# Altium PCB BLDC-Driver-v2.0.PcbDoc (part 1 of 6)
Units mil, origin at the board's own origin, x right, y up, seen from the top; angles counter-clockwise.
Board outline 5905.51 x 4330.71 mil, 4 copper layers (Top Layer, Layer 1, Layer 2, Bottom Layer), stack 62.047 mil thick; 284 components, 198 nets, 819 pads, 521 vias.
Unrouted connection lines stored in the file: 1.
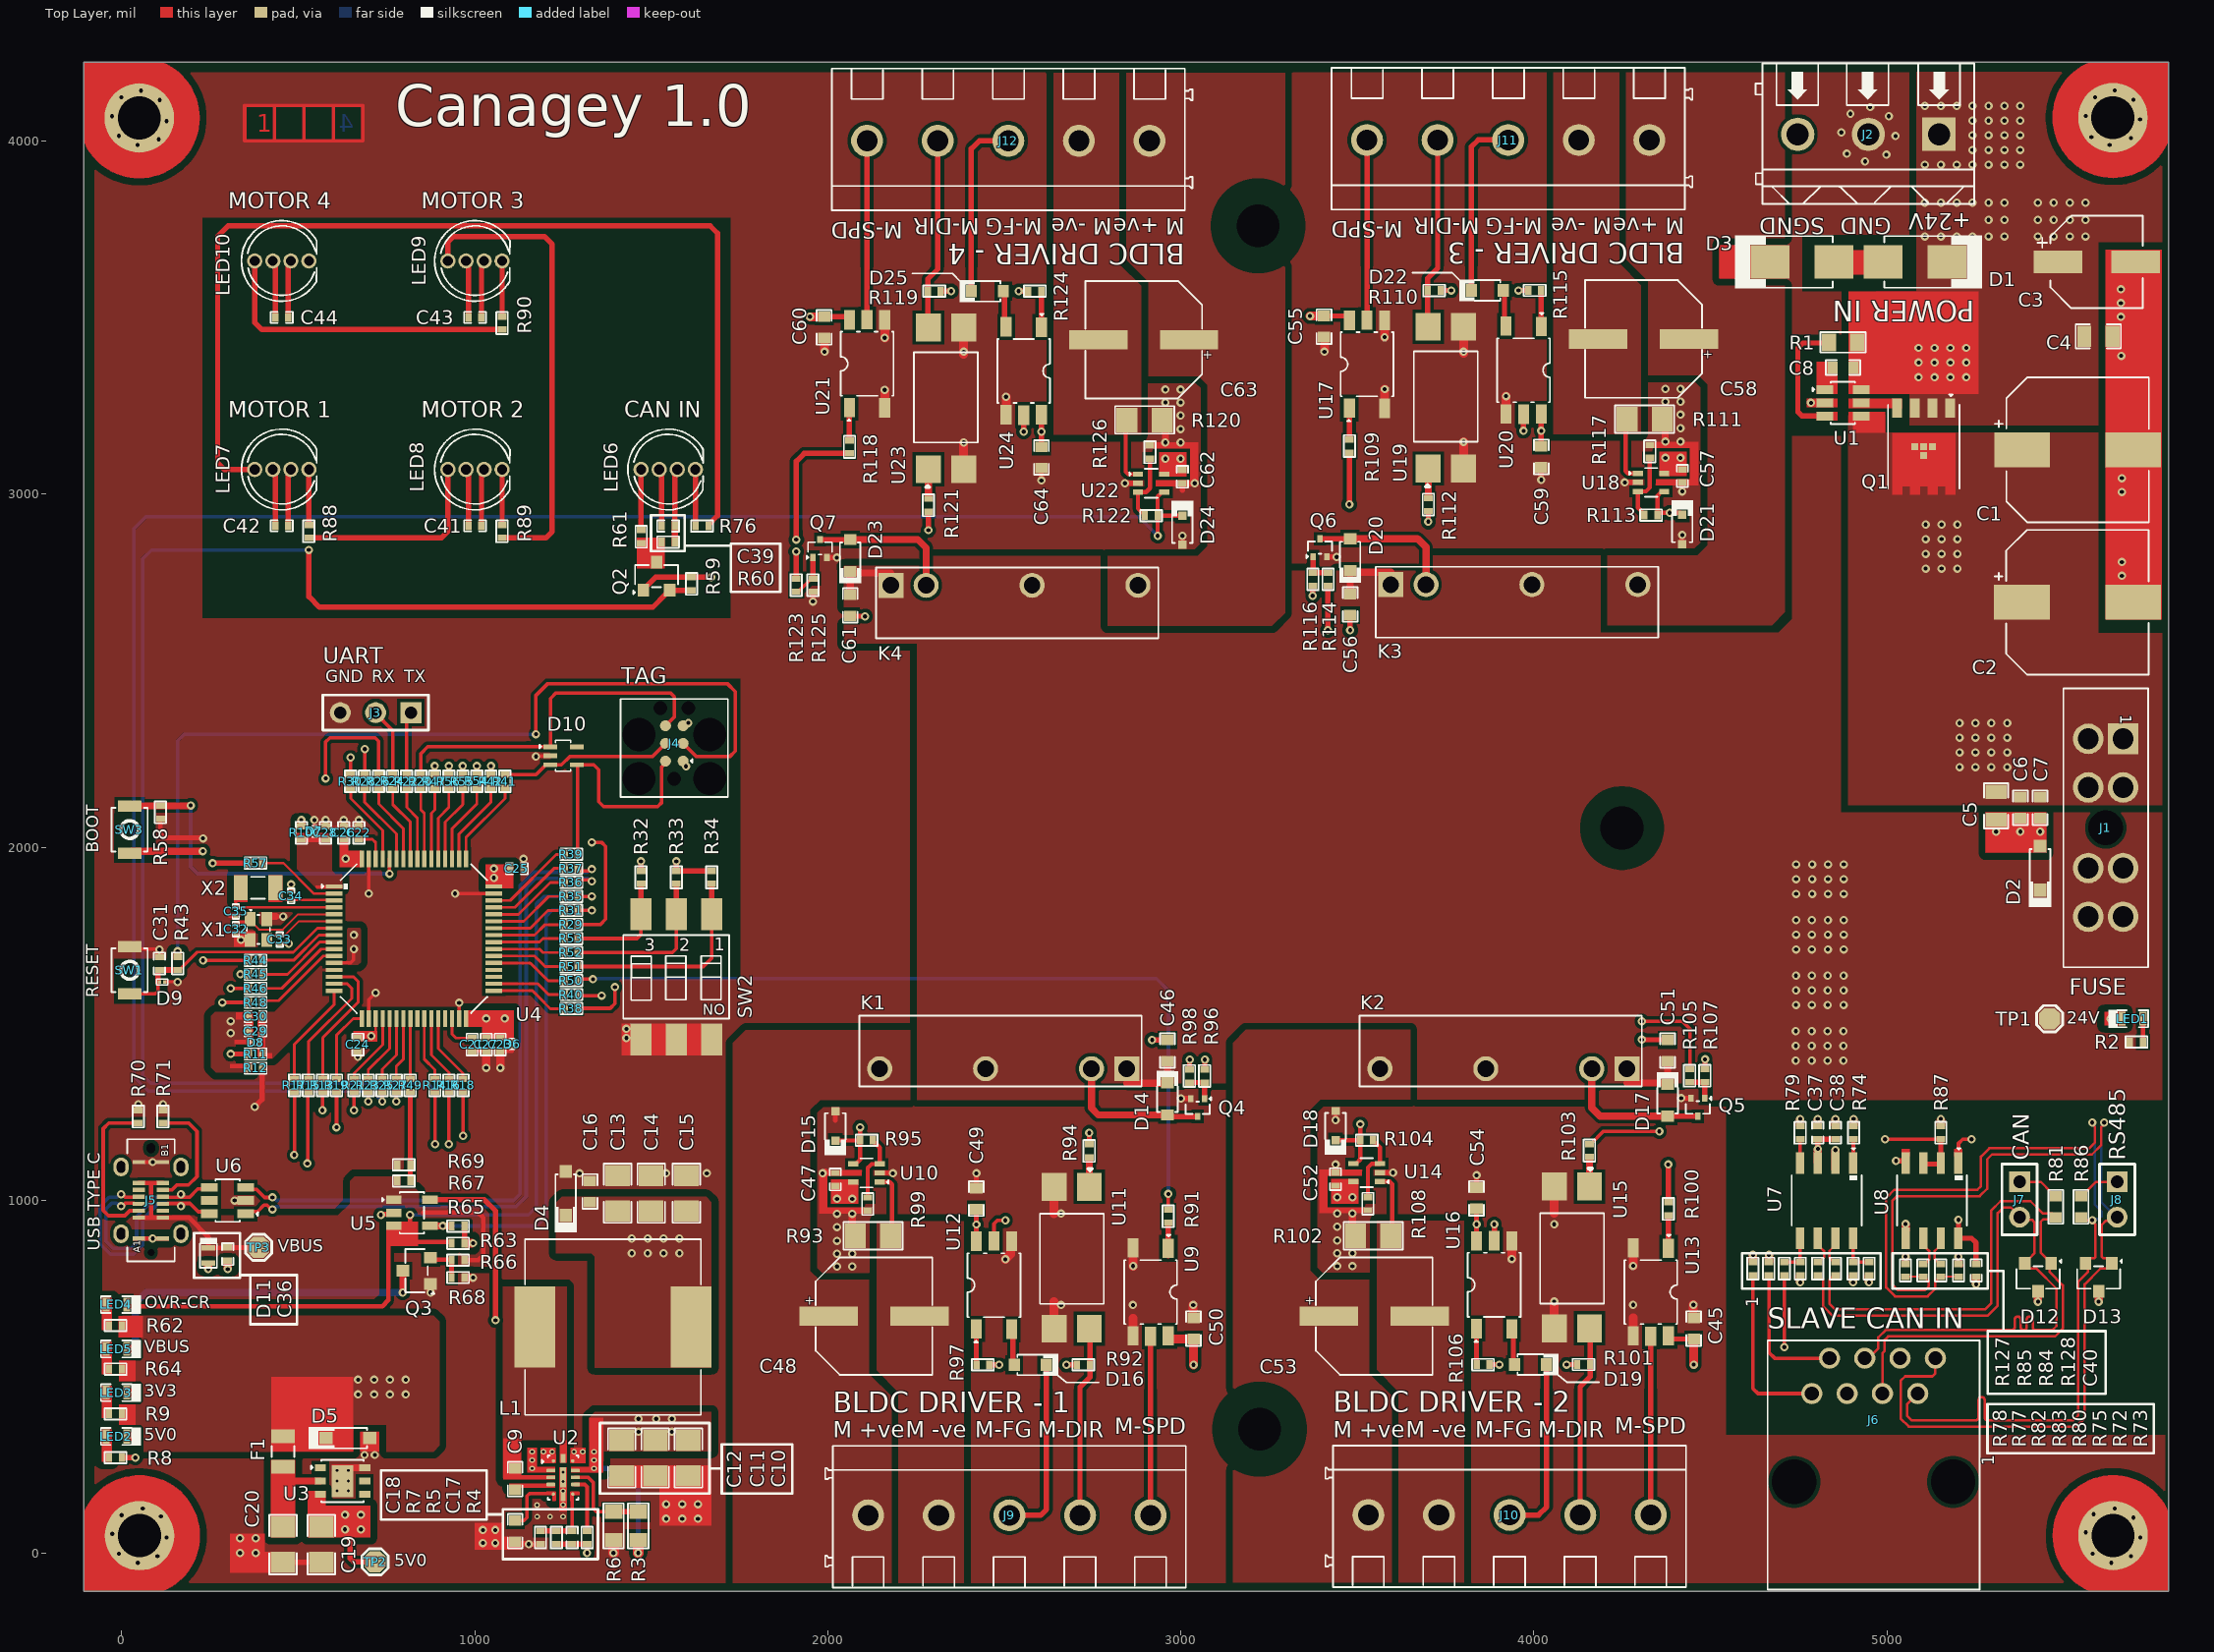
[diagram p0: Top Layer view]
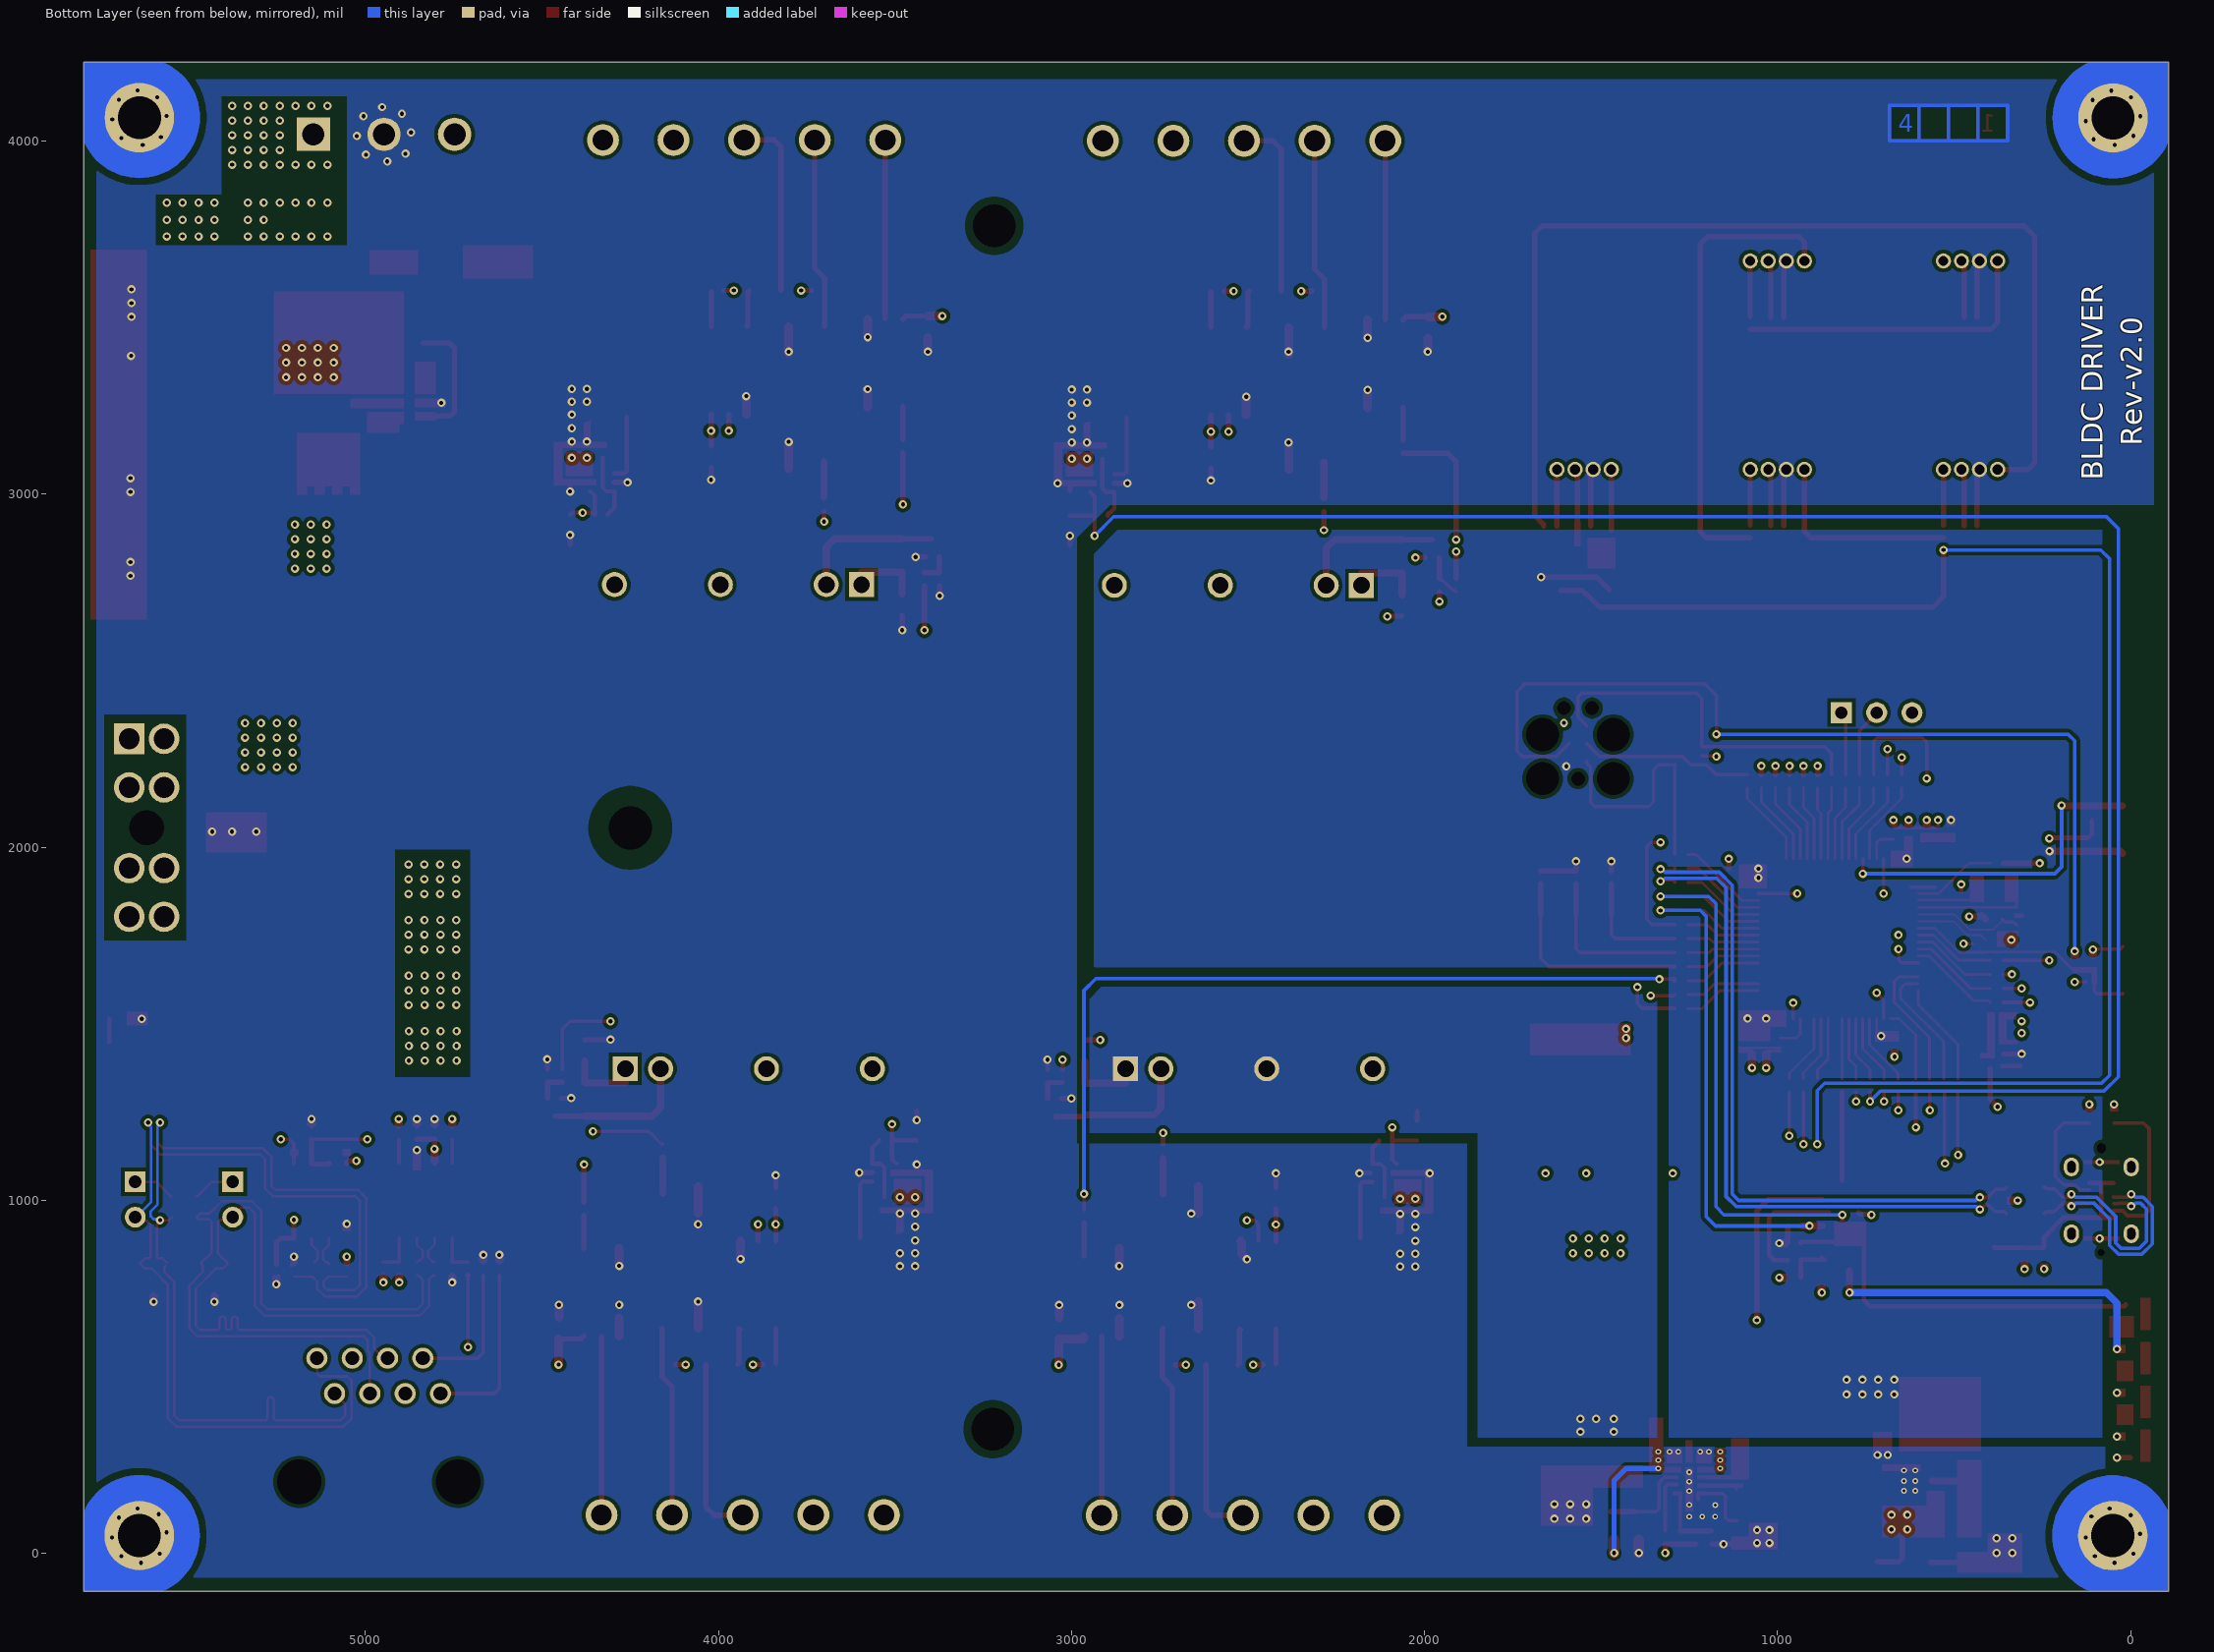
[diagram p1: Bottom Layer view, seen from below]
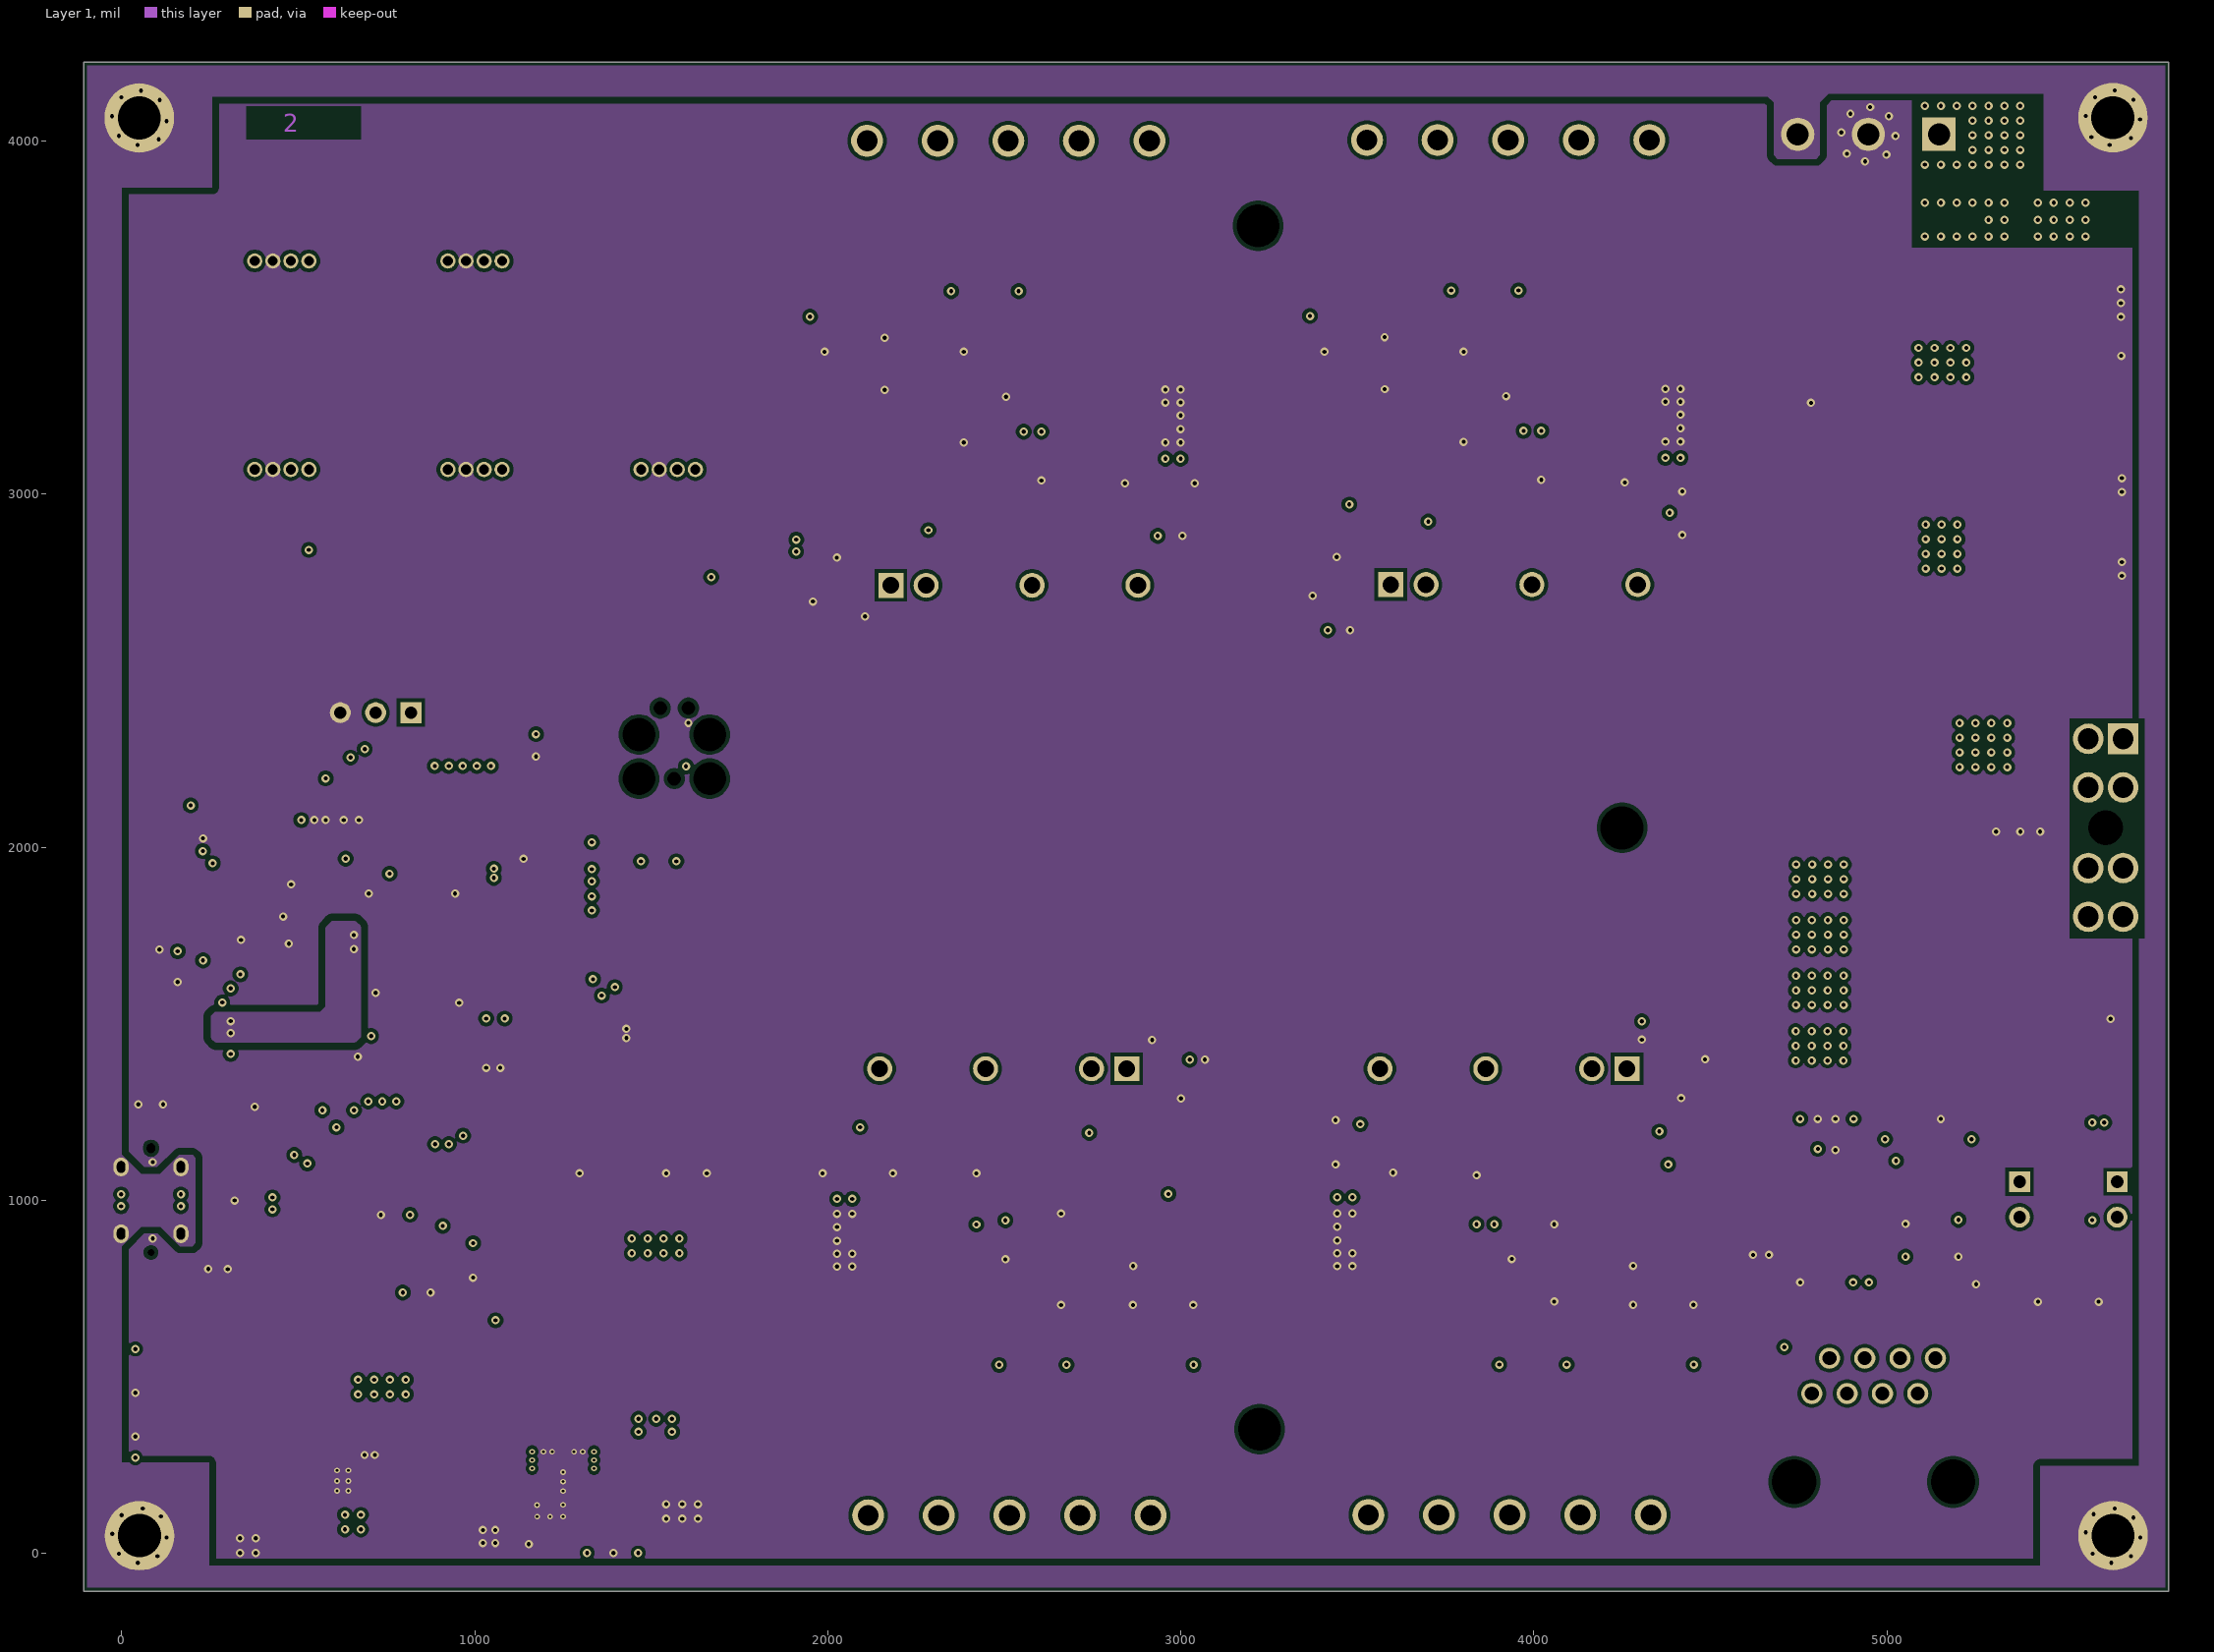
[diagram p2: Layer 1]
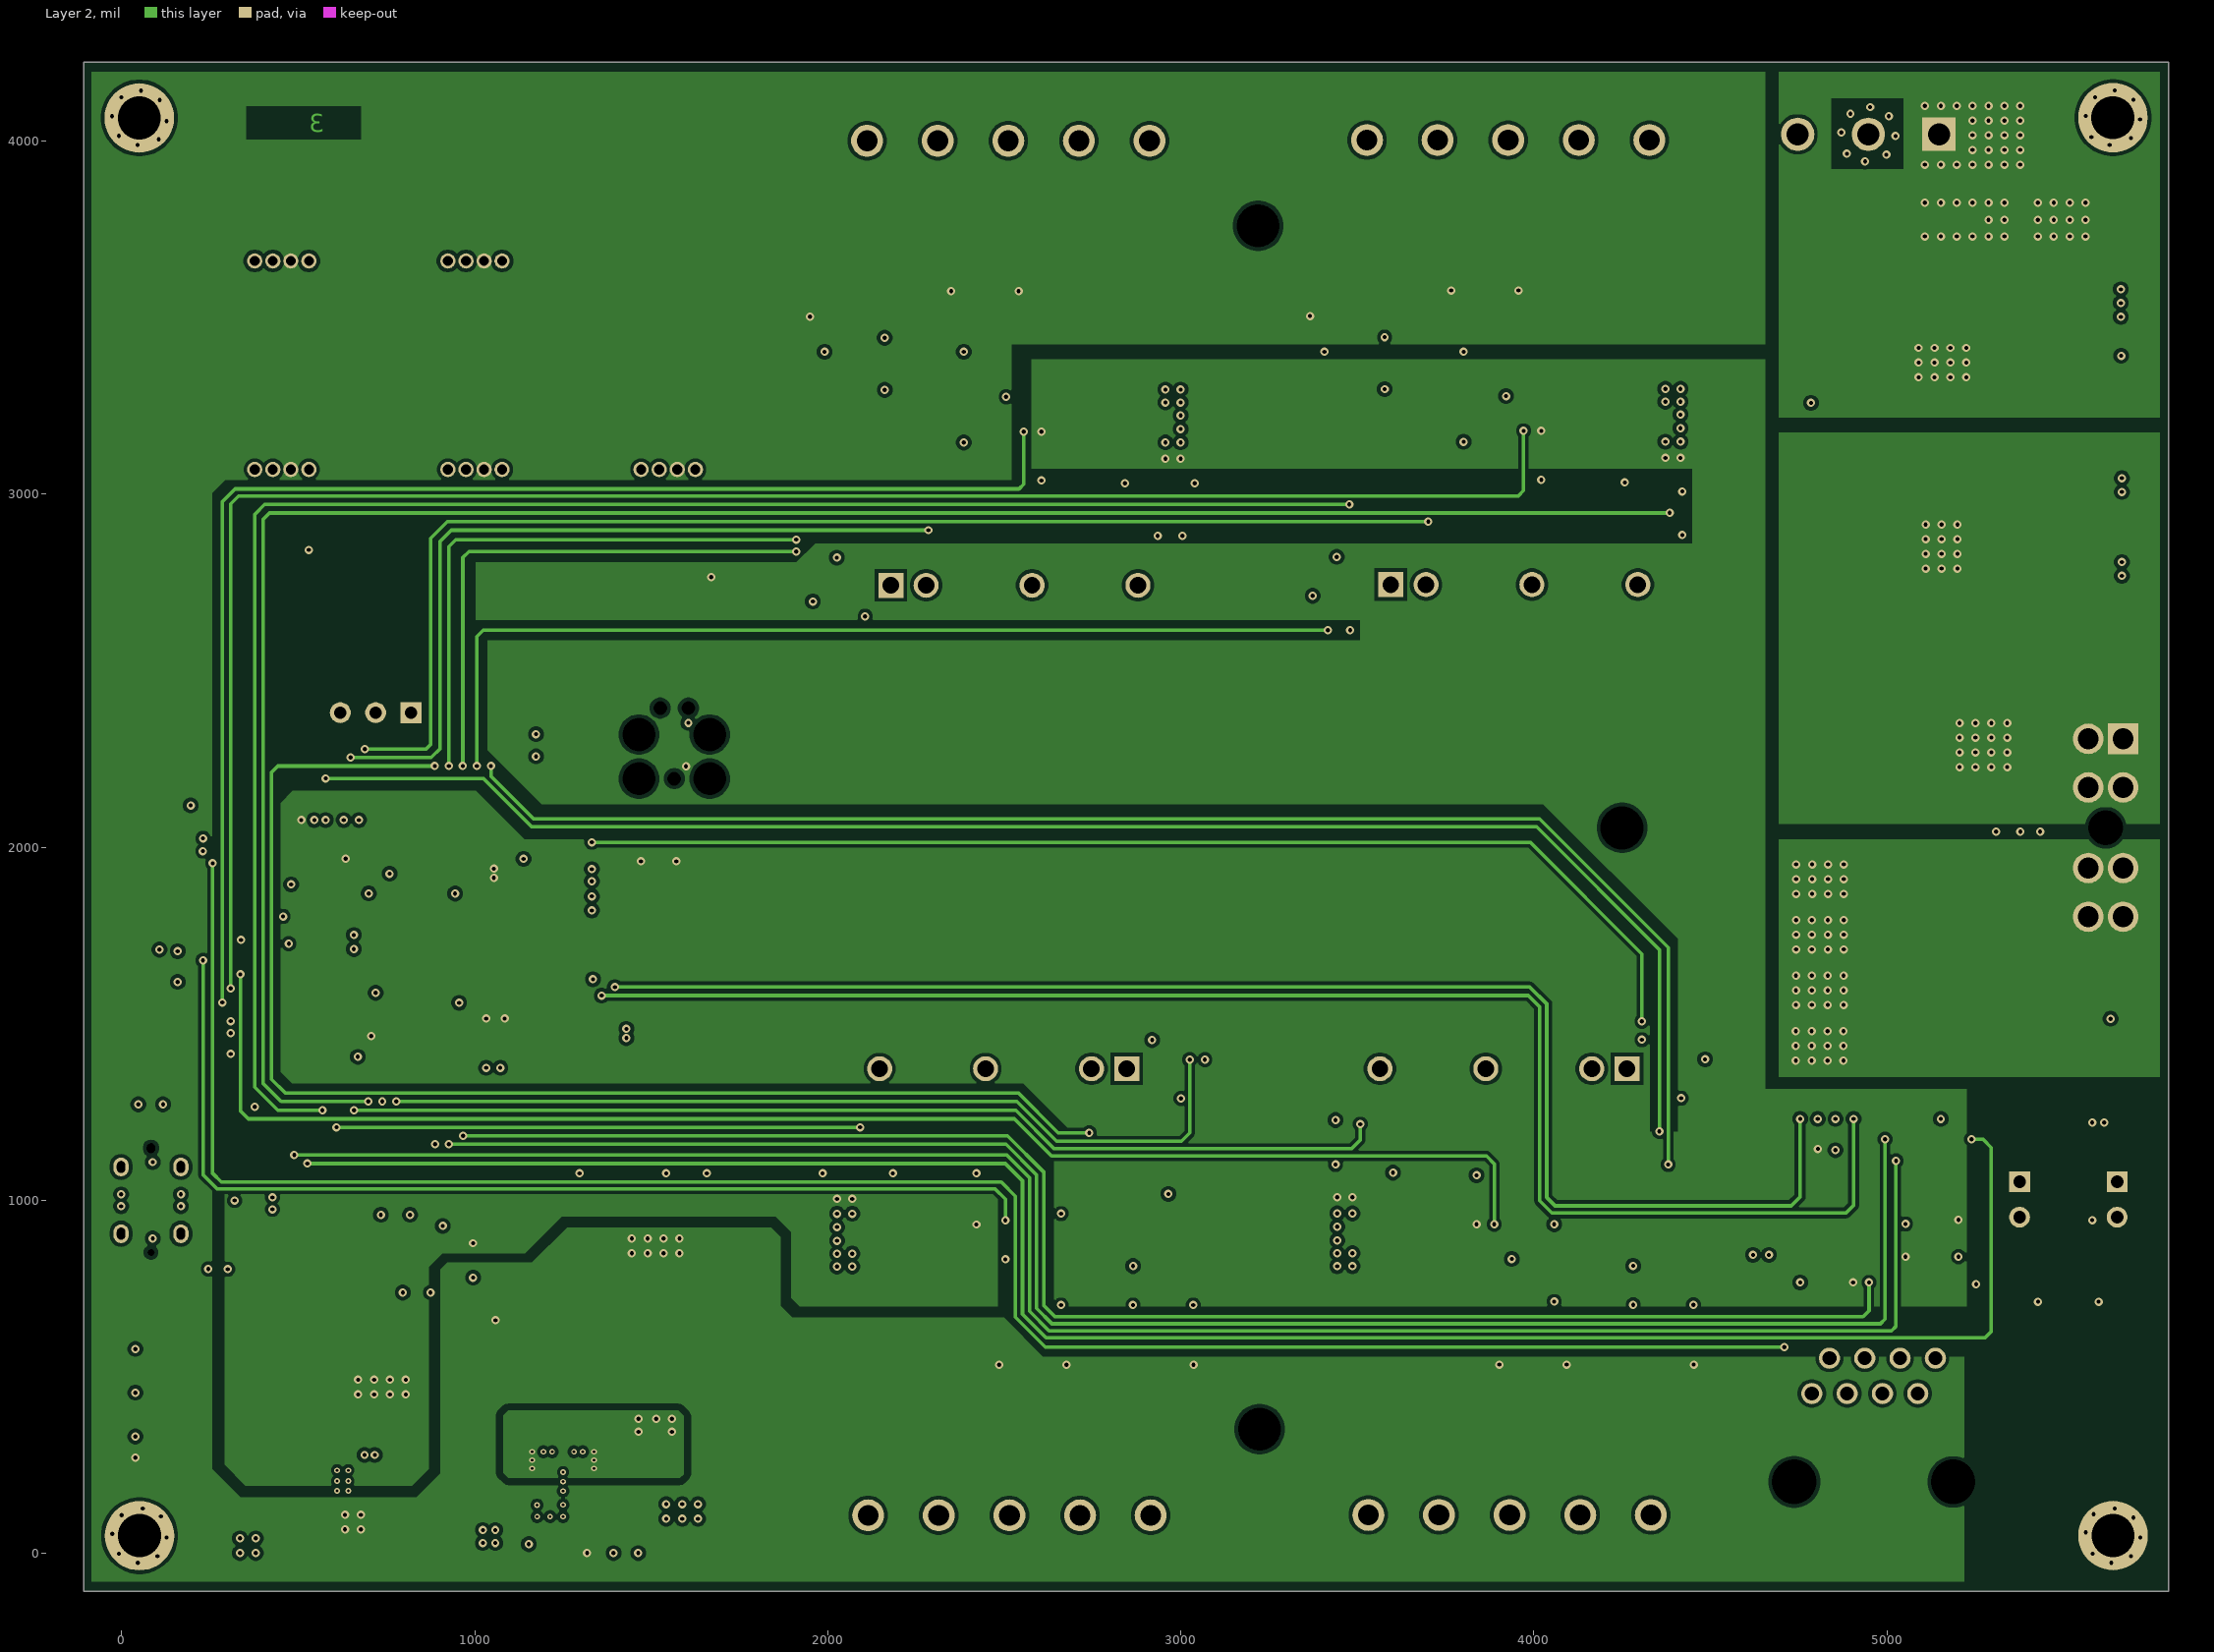
[diagram p3: Layer 2]
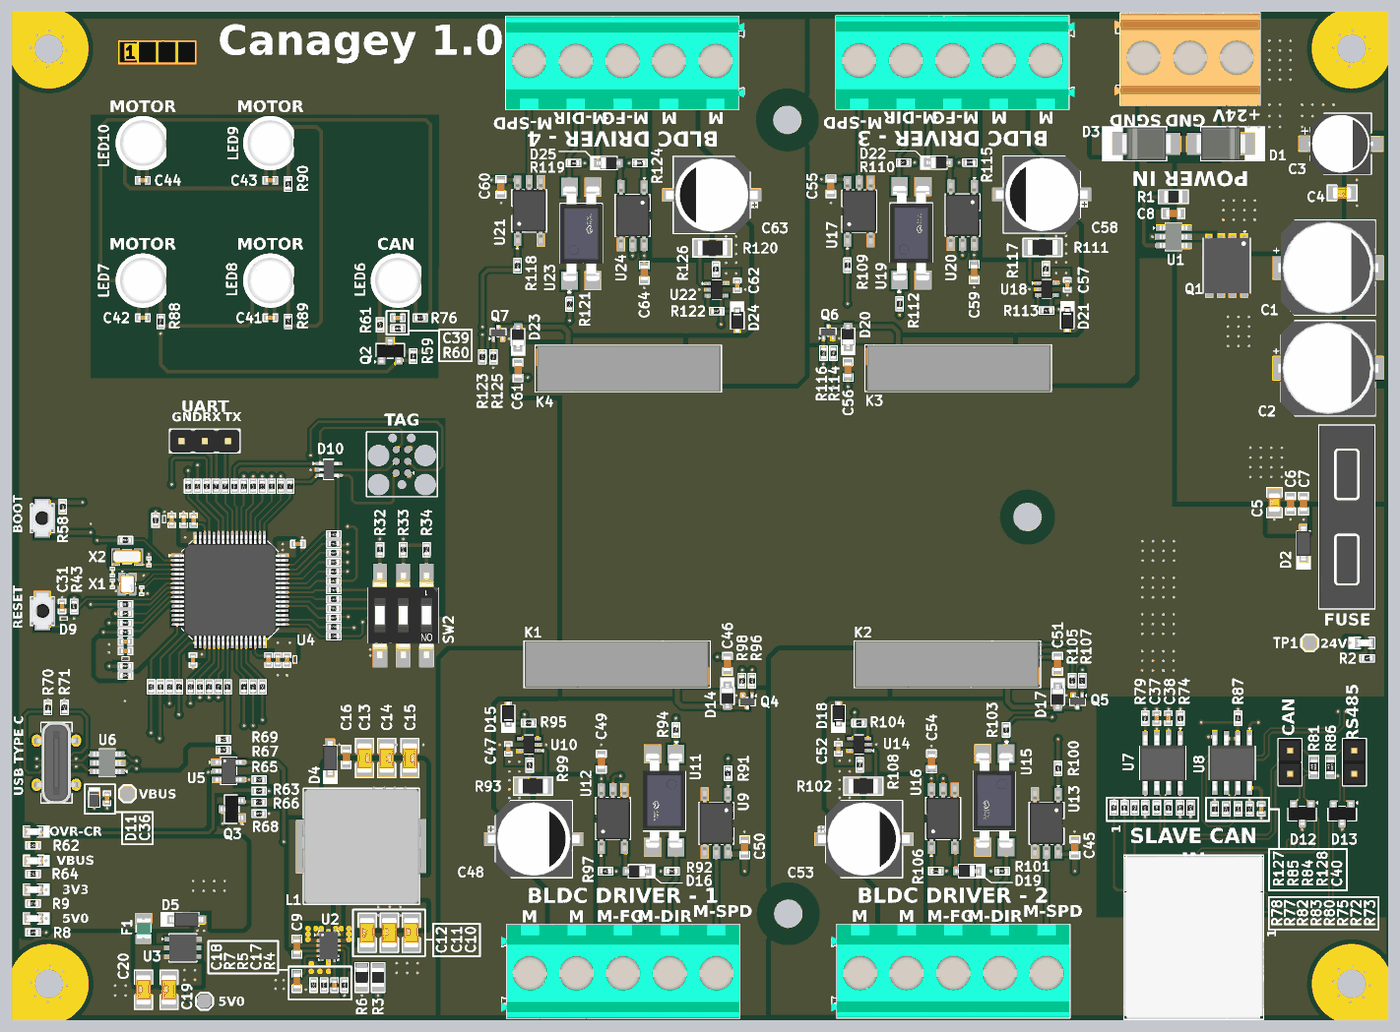
[diagram p6: 3D render of the assembled board from above, using the file's embedded part models]

## Layer stack, top to bottom
Top Solder: solder mask 0.4, Solder Resist, Dk 3.5
Top Layer: signal copper 1.378
Dielectric 2: prepreg 7.992, PP-006, Dk 4.4
Layer 1: signal copper 1.378
Dielectric 1: dielectric 40.551, FR-4, Dk 4.6
Layer 2: signal copper 1.378
Dielectric 3: prepreg 7.992, PP-006, Dk 4.4
Bottom Layer: signal copper 1.378
Bottom Solder: solder mask 0.4, Solder Resist, Dk 3.5

## Board outline
-107.18,-107.18 -107.18,4223.53 5798.33,4223.53 5798.33,-107.18

## Design rules (kind name [scope] priority, off if disabled: settings)
BoardOutlineClearance [All] p1: gap=0 ignorepadtopadclearanceinfootprint=FALSE except(10: Arc-OutlineEdge SMDPad-OutlineEdge THPad-OutlineEdge Via-OutlineEdge Fill-OutlineEdge Poly-OutlineEdge)
Clearance [All] p1: gap=10 ignorepadtopadclearanceinfootprint=FALSE except(4: SMDPad-SMDPad; 7: Arc-SMDPad Arc-Fill Track-Track Track-SMDPad Track-Via Track-Fill Track-Region Track-Text SMDPad-Fill SMDPad-Region THPad-THPad Fill-Fill; 20: Fill-Poly Poly-Poly Poly-Region Region-Region)
Clearance Clearance_DIFF [InAnyDifferentialPair] p2: gap=10 ignorepadtopadclearanceinfootprint=FALSE except(4: SMDPad-SMDPad; 5: Arc-Arc Arc-Track; 7: Arc-SMDPad Arc-Fill Track-Track Track-SMDPad Track-Via Track-Fill Track-Region Track-Text SMDPad-Fill SMDPad-Region THPad-THPad Fill-Fill; 20: Fill-Poly Poly-Poly Poly-Region Region-Region)
Clearance Clearance_BOTTOM [OnLayer('Bottom Layer')] p3: gap=10 ignorepadtopadclearanceinfootprint=FALSE except(4: SMDPad-SMDPad; 7: Arc-SMDPad Track-Track Track-SMDPad THPad-THPad; 9: Track-Via; 20: Arc-Poly Track-Poly SMDPad-Poly THPad-Poly Via-Poly Fill-Poly Poly-Poly Poly-Region Region-Region)
DiffPairsRouting DIFF_USB [InDifferentialPairClass('DIFF_USB')] p1: maxlimit=10 minlimit=7 mostfreqgap=10 toplayer_maxgap=7 toplayer_prefgap=7 toplayer_minwidth=10 toplayer_maxwidth=10 toplayer_prefwidth=10 midlayer1_mingap=10 midlayer1_minwidth=7.5 midlayer1_maxwidth=7.5 midlayer1_prefwidth=7.5 midlayer2_mingap=10 midlayer2_minwidth=7.5 midlayer2_maxwidth=7.5 midlayer2_prefwidth=7.5 bottomlayer_maxgap=7 bottomlayer_prefgap=7 bottomlayer_minwidth=10 bottomlayer_maxwidth=10 bottomlayer_prefwidth=10 impedanceprofiledriven=TRUE impedanceprofileid={FF5DAFE1-98B4-493E-B4A7-3D2591EC31F9} impedanceprofilevalue=90.000000 maxuncoupledlength=500
DiffPairsRouting DIFF_CAN1 [InDifferentialPairClass('DIFF_CAN')] p2: maxlimit=15 minlimit=11 mostfreqgap=15 toplayer_maxgap=11 toplayer_prefgap=11 toplayer_minwidth=7 toplayer_maxwidth=7 toplayer_prefwidth=7 midlayer1_mingap=15 midlayer1_minwidth=4 midlayer1_maxwidth=4 midlayer1_prefwidth=4 midlayer2_mingap=15 midlayer2_minwidth=4 midlayer2_maxwidth=4 midlayer2_prefwidth=4 bottomlayer_maxgap=11 bottomlayer_prefgap=11 bottomlayer_minwidth=7 bottomlayer_maxwidth=7 bottomlayer_prefwidth=7 impedanceprofiledriven=TRUE impedanceprofileid={AF431588-A3C0-40A6-A26B-CB03469C8758} impedanceprofilevalue=120.000000 maxuncoupledlength=500
DiffPairsRouting DIFF_RS485 [InDifferentialPairClass('DIFF_RS485')] p3: maxlimit=15 minlimit=11 mostfreqgap=15 toplayer_maxgap=11 toplayer_prefgap=11 toplayer_minwidth=7 toplayer_maxwidth=7 toplayer_prefwidth=7 midlayer1_mingap=15 midlayer1_minwidth=4 midlayer1_maxwidth=4 midlayer1_prefwidth=4 midlayer2_mingap=15 midlayer2_minwidth=4 midlayer2_maxwidth=4 midlayer2_prefwidth=4 bottomlayer_maxgap=11 bottomlayer_prefgap=11 bottomlayer_minwidth=7 bottomlayer_maxwidth=7 bottomlayer_prefwidth=7 impedanceprofiledriven=TRUE impedanceprofileid={AF431588-A3C0-40A6-A26B-CB03469C8758} impedanceprofilevalue=120.000000 maxuncoupledlength=500
HoleSize [All] p1: absolutevalues=TRUE maxlimit=137.8 minlimit=1 maxpercent=80.000 minpercent=20.000
MinimumSolderMaskSliver [All] p1: minsoldermaskwidth=0
PolygonConnect [All] p1: connectstyle=Direct reliefconductorwidth=10 reliefentries=4 polygonreliefangle="90 Angle" airgapwidth=10
RoutingVias [All] p1: holewidth=11.81 width=23.62 viastyle="Through Hole" minholewidth=7.87 minwidth=15.75 maxholewidth=11.81 maxwidth=23.62
SilkToSilkClearance [All] p1: silktosilkclearance=0
SilkToSolderMaskClearance [IsPad] p1: minsilkscreentomaskgap=0 clearancetoexposedcopper=TRUE
SolderMaskExpansion [All] p1: expansion=4 istentingtop=FALSE
SupplyNets "Schematic Supply Nets_9" [InNet('3V3')] p1: voltage=0.000
SupplyNets "Schematic Supply Nets_8" [InNet('VIN')] p2: voltage=0.000
SupplyNets "Schematic Supply Nets_7" [InNet('GND')] p3: voltage=0.000
SupplyNets "Schematic Supply Nets_6" [InNet('24V')] p4: voltage=0.000
SupplyNets "Schematic Supply Nets_5" [InNet('AGND')] p5: voltage=0.000
SupplyNets "Schematic Supply Nets_4" [InNet('5V')] p6: voltage=0.000
SupplyNets "Schematic Supply Nets_3" [InNet('AVDD')] p7: voltage=0.000
SupplyNets "Schematic Supply Nets_2" [InNet('SHGND')] p8: voltage=0.000
SupplyNets "Schematic Supply Nets_1" [InNet('VBAT')] p9: voltage=0.000
SupplyNets "Schematic Supply Nets" [InNet('VBUSc')] p10: voltage=0.000
Width [All] p1: maxlimit=50 minlimit=4 preferedwidth=6 minimp=50.000000 maximp=50.000000 favimp=50.000000
25 further rules are at their usual default settings.

## Classes and differential pairs
differential pair class DIFF_RS485: RS485
differential pair class DIFF_CAN: CAN1 RS485
differential pair class DIFF_USB: USB USB_FS
component class U_BLDC-Driver-Sheet: C45 C46 C47 C48 C49 C50 C51 C52 C53 C54 C55 C56 C57 C58 C59 C60 C61 C62 C63 C64 D14 D15 D16 D17 D18 D19 D20 D21 D22 D23 D24 D25 J9 J10 J11 J12 K1 K2 K3 K4 Q4 Q5 Q6 Q7 R91 R92 R93 R94 R95 R96 R97 R98 R99 R100 R101 R102 R103 R104 R105 R106 R107 R108 R109 R110 R111 R112 R113 R114 R115 R116 R117 R118 R119 R120 R121 R122 R123 R124 R125 R126 U9 U10 U11 U12 U13 U14 U15 U16 U17 U18 U19 U20 U21 U22 U23 U24
component class U_USB-Sheet: C36 D11 J5 LED4 LED5 Q3 R62 R63 R64 R65 R66 R67 R68 R69 R70 R71 TP3 U5 U6
component class U_Power-Sheet: C1 C2 C3 C4 C5 C6 C7 C8 C9 C10 C11 C12 C13 C14 C15 C16 C17 C18 C19 C20 D1 D2 D3 D4 D5 F1 J1 J2 L1 LED1 LED2 LED3 Q1 R1 R2 R3 R4 R5 R6 R7 R8 R9 TP1 TP2 U1 U2 U3
component class U_Controller-Sheet-2: C31 C32 C33 C34 C35 D9 D10 J3 J4 Q2 R13 R14 R15 R16 R17 R18 R19 R20 R21 R22 R23 R24 R25 R26 R27 R28 R29 R30 R31 R32 R33 R34 R35 R36 R37 R38 R39 R40 R41 R42 R43 R44 R45 R46 R47 R48 R49 R50 R51 R52 R53 R54 R55 R56 R57 R58 R59 R60 R61 SW1 SW2 SW3 X1 X2
component class U_Controller-Sheet-1: C21 C22 C23 C24 C25 C26 C27 C28 C29 C30 D6 D7 D8 R10 R11 R12 U4
component class U_Comms-Sheet: C37 C38 C39 C40 C41 C42 C43 C44 D12 D13 J6 J7 J8 LED6 LED7 LED8 LED9 LED10 R72 R73 R74 R75 R76 R77 R78 R79 R80 R81 R82 R83 R84 R85 R86 R87 R88 R89 R90 R127 R128 U7 U8
differential pair USB: +USB_P -USB_N
differential pair USB_FS: +USB_FS_P -USB_FS_N
differential pair RS485: +RS485_P -RS485_N
differential pair CAN1: +CAN1_P -CAN1_N

## Components (designator, comment, footprint, x,y, rotation, side; value= is the part's Value field where it differs from the comment)
C1 "220uF" UCD-220uF-10mmDia 5540.48,3125.56 r0 top locked
C2 "220uF" UCD-220uF-10mmDia 5540.06,2693.77 r0 top locked
C3 "47uF" RVT1H470M0607 5594.52,3657.77 r0 top locked
C4 "22nF" Cap-0805 5599.26,3447.07 r180 top
C5 "10uF" Cap-0805 5309.26,2117.08 r90 top locked
C6 "1uF" Cap-0603 5378.26,2112.08 r90 top locked
C7 "0.1uF" Cap-0603 5434.27,2112.07 r90 top locked value=100nF
C8 "1uF" Cap-0603 4875.88,3358.46 r0 top locked
C9 "0.1uF" Cap-0603 1114.86,210.12 r270 top value=100nF
C10 "4.7uF" Cap-1206 1605.73,270 r90 top
C11 "220nF" Cap-1206 1511.59,270.03 r90 top
C12 "220nF" Cap-1206 1416.62,270 r90 top
C13 "47uF" Cap-1206 1405,1020 r270 top
C14 "47uF" Cap-1206 1500,1020 r270 top
C15 "47uF" Cap-1206 1600,1020 r270 top
C16 "0.1uF" Cap-0603 1326.49,1024.81 r270 top value=100nF
C17 "6.8pF" Cap-0402 1275.96,44.78 r270 top
C18 "1uF" Cap-0603 1114.86,62.78 r90 top
C19 "4.7uF" Cap-1206 566,24.81 r90 top
C20 "4.7uF" Cap-1206 456.84,24.81 r90 top
C21 "2.2uf" Cap-0402 992.79,1441.09 r270 top
C22 "2.2uf" Cap-0402 672.14,2041.09 r90 top
C23 "4.7uF" Cap-0402 1072.47,1441.09 r90 top
C24 "0.1uF" Cap-0402 669,1441.09 r90 top value=100nF
C25 "0.1uF" Cap-0402 1119.44,1939.06 r180 top value=100nF
C26 "0.1uF" Cap-0402 629.15,2041.09 r270 top value=100nF
C27 "0.1uF" Cap-0402 1032.6,1441.09 r90 top value=100nF
C28 "1uF" Cap-0402 577.88,2041.09 r270 top
C29 "1uF" Cap-0402 379.28,1479.65 r0 top
C30 "0.1uF" Cap-0402 379.29,1520.15 r0 top value=100nF
C31 "0.1uF" Cap-0402 107.2,1670.81 r270 top locked value=100nF
C32 "15pF" Cap-0201 323.51,1767.9 r90 top
C33 "15pF" Cap-0201 448.39,1738.68 r90 top
C34 "15pF" Cap-0201 479.87,1862.11 r270 top
C35 "15pF" Cap-0201 323.51,1817.99 r90 top
C36 "4.7uF" Cap-0402 300.5,847.5 r270 top
C37 "0.1uF" Cap-0402 4804.16,1191.28 r270 top value=100nF
C38 "4.7uF" Cap-0402 4854.66,1191.28 r270 top
C39 "0.1uF" Cap-0402 1548.08,2910.01 r0 top value=100nF
C40 "0.1uF" Cap-0402 5252.96,801.28 r90 top value=100nF
C41 "0.1uF" Cap-0402 1000.84,2910.56 r0 top locked value=100nF
C42 "0.1uF" Cap-0402 453.71,2910.56 r0 top locked value=100nF
C43 "0.1uF" Cap-0402 1000.84,3500.56 r0 top locked value=100nF
C44 "0.1uF" Cap-0402 453.71,3500.56 r0 top locked value=100nF
C45 "0.1uF" Cap-0603 4453.11,636.94 r90 top value=100nF
C46 "0.1uF" Cap-0603 2962.28,1424.38 r90 top value=100nF
C47 "0.1uF" Cap-0402 2021.59,1058.96 r90 top value=100nF
C48 "220uF" SVZ1VM221FBRE00RAXXX 2131.2,671.94 r0 top
C49 "0.1uF" Cap-0603 2420.97,1004.71 r90 top value=100nF
C50 "0.1uF" Cap-0603 3036.27,636.94 r90 top value=100nF
C51 "0.1uF" Cap-0603 4379.28,1424.37 r90 top value=100nF
C52 "0.1uF" Cap-0402 3438.43,1059.82 r90 top value=100nF
C53 "220uF" SVZ1VM221FBRE00RAXXX 3548.04,671.94 r0 top
C54 "0.1uF" Cap-0603 3837.81,1005.56 r90 top value=100nF
C55 "0.1uF" Cap-0603 3405.95,3474.62 r270 top value=100nF
C56 "0.1uF" Cap-0603 3479.78,2687.18 r270 top value=100nF
C57 "0.1uF" Cap-0402 4420.63,3051.74 r270 top value=100nF
C58 "220uF" SVZ1VM221FBRE00RAXXX 4311.02,3439.61 r180 top
C59 "0.1uF" Cap-0603 4021.25,3106 r270 top value=100nF
C60 "0.1uF" Cap-0603 1989.97,3472.48 r270 top value=100nF
C61 "0.1uF" Cap-0603 2063.79,2685.04 r270 top value=100nF
C62 "0.1uF" Cap-0402 3004.65,3049.6 r270 top value=100nF
C63 "220uF" SVZ1VM221FBRE00RAXXX 2895.03,3437.47 r180 top
C64 "0.1uF" Cap-0603 2605.26,3103.86 r270 top value=100nF
D1 "SMBJ58A-13-F" SMB_ 5079.91,3657.85 r0 top locked
D2 "AZ4024-01G" SOD-123 5434.27,1940.94 r270 top locked
D3 "SMBJ26A-13-F" SMB_ 4760.04,3657.85 r180 top locked
D4 "AZ3005-01G" SOD-123 1257.91,1019.71 r270 top
D5 "AZ3003-01G" SOD-123 640.72,326.54 r180 top
D6 "ESDM2033MX4T5G" DFN-2(0.3x0.6) 1106.01,1442.84 r90 top
D7 "ESDM2033MX4T5G" DFN-2(0.3x0.6) 545.95,2045.38 r270 top
D8 "ESDM2033MX4T5G" DFN-2(0.3x0.6) 379.51,1447.09 r0 top
D9 "ESDM2033MX4T5G" DFN-2(0.3x0.6) 114.88,1618.48 r180 top locked
D10 "ESDALC6V1W5" SOT-323-5 1252,2259 r0 top
D11 "ESDA7P60-1U1M" "Diode 1610" 245.5,843.51 r270 top locked
D12 "CDSOT23-T24CAN-Q" SOT-23 5428.45,781.66 r180 top
D13 "SM712" SOT-23 5599.96,781.66 r180 top
D14 "1N4148WS-7-F" SOD-323 2962.28,1287.23 r270 top
D15 "MM3Z3V3B" SOD323F 2021.59,1210.66 r270 top
D16 "1N4148WS-7-F" SOD-323 2573.94,533.79 r180 top
D17 "1N4148WS-7-F" SOD-323 4379.28,1283.23 r270 top
D18 "MM3Z3V3B" SOD323F 3438.43,1211.52 r270 top
D19 "1N4148WS-7-F" SOD-323 3991,534.55 r180 top
D20 "1N4148WS-7-F" SOD-323 3479.78,2828.32 r90 top
D21 "MM3Z3V3B" SOD323F 4420.63,2900.04 r90 top
D22 "1N4148WS-7-F" SOD-323 3868.06,3577 r0 top
D23 "1N4148WS-7-F" SOD-323 2063.8,2826.18 r90 top
D24 "MM3Z3V3B" SOD323F 3004.65,2897.9 r90 top
D25 "1N4148WS-7-F" SOD-323 2452.08,3574.86 r0 top
F1 "0805L110SLYR" Fuse-0805 456.8,288.1 r90 top
J1 "178.6165.0002" 178.6165.0002 5620.05,2055.11 r270 top locked
J2 "DB128L-5.08-3P-OG-S" DB128L-5.08-3P-OG-S 4947.63,4019.27 r180 top locked
J3 "X6511WV-03H-C60D30" HDR1X3_ 819.43,2381.09 r180 top
J4 "TC2030-IDC" TC2030-IDC_ 1565.56,2294.05 r90 top
J5 "U263-163N-4BQC65" U263-163N-4BQC65 83.07,999.84 r90 top locked
J6 "HC-RJ45-5622-1-6-Y" HC-RJ45-5622-1-6-Y 4962.62,377.67 r0 top locked
J7 "X6511WV-02H-C60D30" HDR1X2_ 5376.11,1052.18 r270 top
J8 "X6511WV-02H-C60D30" HDR1X2_ 5652.3,1052.18 r270 top
J9 "DB128V-5.08-5P-GN-S" DB128V-5.08-5P-GN-S 2514.67,107.71 r0 top
J10 "DB128V-5.08-5P-GN-S" DB128V-5.08-5P-GN-S 3931.51,108.56 r0 top
J11 "DB128V-5.08-5P-GN-S" DB128V-5.08-5P-GN-S 3927.55,4002.99 r180 top
J12 "DB128V-5.08-5P-GN-S" DB128V-5.08-5P-GN-S 2511.57,4000.85 r180 top
K1 "G6DN-1A-SLDC24" "G6DN-1A-SL DC24" 2497.23,1372.57 r180 top
K2 "G6DN-1A-SLDC24" "G6DN-1A-SL DC24" 3914.23,1372.57 r180 top
K3 "G6DN-1A-SLDC24" "G6DN-1A-SL DC24" 3944.83,2743.99 r0 top
K4 "G6DN-1A-SLDC24" "G6DN-1A-SL DC24" 2528.85,2741.84 r0 top
L1 "15uH" SRP1265A-150M 1391.49,640.9 r180 top
LED1 "RED" LED-0603 5696.06,1514.24 r180 top locked
LED2 "RED" LED-0603 -14.72,331 r0 top locked
LED3 "RED" LED-0603 -14.72,455.12 r0 top locked
LED4 "RED" LED-0603 -14.72,704.56 r0 top locked
LED5 "Emerald" LED-0603 -14.72,578.93 r0 top locked
LED6 "WS2812D-F5" WS2812D-F5 1548.2,3070.01 r0 top locked
LED7 "WS2812D-F5" WS2812D-F5 453.71,3070.01 r0 top locked
LED8 "WS2812D-F5" WS2812D-F5 1000.96,3070.01 r0 top locked
LED9 "WS2812D-F5" WS2812D-F5 1000.96,3660.56 r0 top locked
LED10 "WS2812D-F5" WS2812D-F5 453.71,3660.56 r0 top locked
Q1 "CSD18532Q5BT" SON-8(5x6) 5104.64,3189.19 r270 top locked
Q2 "Si2302CDS" Sot-23 1515.09,2767.45 r0 top locked
Q3 "MMBT3904" SOT-23 835.74,800.4 r90 top
Q4 "MMBT3904T-7-F" SOT-523 3047.98,1262.62 r180 top
Q5 "MMBT3904T-7-F" SOT-523 4464.82,1263.48 r180 top
Q6 "MMBT3904T-7-F" SOT-523 3394.24,2848.08 r0 top
Q7 "MMBT3904T-7-F" SOT-523 1978.26,2845.94 r0 top
R1 "100K" RES-0805 4875.88,3430 r0 top locked
R2 "3.9K" Res-0402 5707,1448.24 r0 top locked value=3.9kR
R3 "698K" RES-0805 1463.25,77.78 r270 top value=698kR
R4 "100K" Res-0402 1318.86,44.78 r90 top
R5 "100K" Res-0402 1231.46,44.78 r270 top
R6 "51.1K" RES-0805 1393.39,77.78 r90 top value=51.1kR
R7 "24.9K" Res-0402 1186.45,44.78 r90 top
R8 "499R" Res-0402 -17.04,271 r180 top locked
R9 "240R" Res-0402 -17.04,395.2 r180 top
R10 "0R" Res-0402 508.91,2041.09 r270 top
R11 "0R" Res-0402 379.42,1414.27 r180 top
R12 "0R" Res-0402 379.42,1374.09 r180 top
R13 "0R" Res-0402 569.48,1325.57 r270 top
R14 "0R" Res-0402 887.32,1325.44 r90 top
R15 "0R" Res-0402 529.71,1325.57 r270 top
R16 "0R" Res-0402 927.08,1325.44 r90 top
R17 "0R" Res-0402 489.61,1325.57 r270 top
R18 "0R" Res-0402 966.85,1325.44 r90 top
R19 "0R" Res-0402 608.97,1325.45 r270 top
R20 "0R" Res-0402 847.16,2186.74 r270 top
R21 "0R" Res-0402 658.74,1325.44 r270 top
R22 "0R" Res-0402 807.4,2186.74 r270 top
R23 "0R" Res-0402 698.5,1325.44 r270 top
R24 "0R" Res-0402 767.63,2186.75 r270 top
R25 "0R" Res-0402 738.26,1325.44 r270 top
R26 "0R" Res-0402 727.87,2186.74 r270 top
R27 "0R" Res-0402 778.03,1325.44 r270 top
R28 "0R" Res-0402 688.11,2186.74 r270 top
R29 "0R" Res-0402 1273.53,1781.26 r0 top
R30 "0R" Res-0402 648.35,2186.74 r270 top
R31 "0R" Res-0402 1273.53,1821.02 r0 top
R32 "10K" Res-0402 1471.15,1914.72 r90 top
R33 "10K" Res-0402 1571.15,1914.73 r90 top
R34 "10K" Res-0402 1671.15,1914.72 r90 top
R35 "0R" Res-0402 1273.53,1860.78 r0 top
R36 "0R" Res-0402 1273.53,1900.54 r0 top
R37 "0R" Res-0402 1273.53,1940.31 r0 top
R38 "0R" Res-0402 1273.53,1542.67 r180 top
R39 "0R" Res-0402 1273.53,1980.07 r0 top
R40 "0R" Res-0402 1273.53,1582.44 r180 top
R41 "0R" Res-0402 1085.75,2186.74 r90 top
R42 "0R" Res-0402 1045.98,2186.74 r90 top
R43 "0R" Res-0402 159,1670.81 r270 top locked
R44 "0R" Res-0402 379.51,1679.62 r180 top
R45 "0R" Res-0402 379.51,1639.86 r180 top
R46 "0R" Res-0402 379.51,1600.09 r180 top
R47 "0R" Res-0402 886.93,2186.74 r270 top
R48 "0R" Res-0402 379.51,1560.33 r180 top
R49 "0R" Res-0402 817.79,1325.45 r270 top
R50 "0R" Res-0402 1273.53,1622.2 r0 top
R51 "0R" Res-0402 1273.53,1661.96 r0 top
R52 "0R" Res-0402 1273.53,1701.73 r0 top
R53 "0R" Res-0402 1273.53,1741.49 r0 top
R54 "0R" Res-0402 1006.22,2186.75 r90 top
R55 "0R" Res-0402 966.46,2186.74 r90 top
R56 "0R" Res-0402 926.69,2186.74 r90 top
R57 "0R" Res-0402 379.51,1955.23 r180 top
R58 "10K" Res-0402 110,2099 r90 top locked
R59 "10K" Res-0402 1613.97,2746.19 r90 top locked
R60 "10K" Res-0402 1548.08,2864.72 r0 top locked
R61 "75R" Res-0402 1471.68,2879.72 r90 top locked
R62 "240R" Res-0402 -17.04,645 r0 top
R63 "47K" Res-0402 953,878.62 r0 top
R64 "240R" Res-0402 -17.04,522 r0 top
R65 "47K" Res-0402 953,927.22 r0 top
R66 "4.7K" Res-0402 953.01,830.59 r180 top
R67 "200K" Res-0402 799.21,1054.78 r180 top locked value=200kR
R68 "47K" Res-0402 953,781.01 r180 top
R69 "309K" Res-0402 799.21,1100.09 r0 top locked value=309kR
R70 "5.1K" Res-0402 47,1237 r90 top locked
R71 "5.1K" Res-0402 117.13,1237 r90 top locked
R72 "10K" Res-0402 4904.66,806.28 r270 top
R73 "0R" Res-0402 4949.66,806.28 r90 top
R74 "0R" Res-0402 4905.66,1191.28 r270 top
R75 "0R" Res-0402 4854.66,806.28 r270 top
R76 "75R" Res-0402 1643.87,2910.02 r0 top locked
R77 "0R" Res-0402 4666,806.28 r270 top
R78 "0R" Res-0402 4621,806.28 r270 top
R79 "0R" Res-0402 4754.66,1191.28 r270 top
R80 "0R" Res-0402 4804.66,806.28 r270 top
R81 "120R" Res-0603 5478.49,981.7 r270 top
R82 "0R" Res-0402 4709.66,806.28 r90 top
R83 "10K" Res-0402 4754.66,806.28 r90 top
R84 "0R" Res-0402 5152.96,801.28 r270 top
R85 "0R" Res-0402 5102.96,801.28 r270 top
R86 "120R" Res-0603 5549.91,981.7 r270 top
R87 "10K" Res-0402 5152.96,1191.28 r90 top
R88 "75R" Res-0402 530.48,2894.56 r270 top locked
R89 "75R" Res-0402 1077.73,2894.56 r270 top locked
R90 "75R" Res-0402 1077.73,3484.56 r270 top locked
R91 "470R" Res-0402 2964.67,954.71 r270 top
R92 "10K" Res-0402 2724.26,533.71 r180 top
R93 "40mR" Res-1206 2128.2,899.25 r0 top
R94 "470R" Res-0402 2740.98,1140 r270 top
R95 "36K" Res-0402 2110.05,1170.25 r180 top value=36kR
R96 "4.7K" Res-0402 3024.82,1351.8 r270 top
R97 "680R" Res-0402 2439.47,533.71 r0 top
R98 "47K" Res-0402 3067.82,1351.8 r270 top
R99 "1.65K" Res-0402 2113.45,989.39 r90 top
R100 "470R" Res-0402 4381.51,975.56 r270 top
R101 "10K" Res-0402 4141.11,534.56 r180 top
R102 "40mR" Res-1206 3545.04,899.25 r0 top
R103 "470R" Res-0402 4157.82,1140.85 r270 top
R104 "36K" Res-0402 3526.89,1170.25 r180 top value=36kR
R105 "4.7K" Res-0402 4441.82,1352.8 r270 top
R106 "680R" Res-0402 3856.31,534.56 r0 top
R107 "47K" Res-0402 4484.82,1352.8 r270 top
R108 "1.65K" Res-0402 3530.3,990.25 r90 top
R109 "470R" Res-0402 3477.55,3135.99 r90 top
R110 "10K" Res-0402 3717.95,3577 r0 top
R111 "40mR" Res-1206 4314.02,3212.31 r180 top
R112 "470R" Res-0402 3701.23,2970.7 r90 top
R113 "36K" Res-0402 4332.16,2941.31 r0 top value=36kR
R114 "4.7K" Res-0402 3417.23,2758.76 r90 top
R115 "680R" Res-0402 4002.75,3576.99 r180 top
R116 "47K" Res-0402 3374.24,2758.75 r90 top
R117 "1.65K" Res-0402 4328.76,3121.31 r270 top
R118 "470R" Res-0402 2061.57,3133.85 r90 top
R119 "10K" Res-0402 2301.97,3574.85 r0 top
R120 "40mR" Res-1206 2898.03,3210.17 r180 top
R121 "470R" Res-0402 2285.25,2968.56 r90 top
R122 "36K" Res-0402 2916.18,2939.17 r0 top value=36kR
R123 "4.7K" Res-0402 1910.45,2742.49 r270 top
R124 "680R" Res-0402 2586.77,3574.85 r180 top
R125 "47K" Res-0402 1958.26,2742.49 r90 top
R126 "1.65K" Res-0402 2912.78,3119.17 r270 top
R127 "560R" Res-0402 5052.96,801.29 r90 top
R128 "560R" Res-0402 5202.96,801.28 r90 top
SW1 "B3U-1000P" B3U-1000P 22.71,1651.5 r90 top locked
SW2 "DSIC03LSGET" DSIC03LSGET 1571.15,1632.93 r270 top
SW3 "B3U-1000P" B3U-1000P 22.71,2050 r270 top locked
TP1 "TEST POINT" Test-point 5461.06,1514.24 r0 top
TP2 "TEST POINT" Test-point 718,-24 r0 top
TP3 "TEST POINT" Test-point 388.07,866.84 r0 top
U1 "LM74700QDBVRQ1" SOT-23-6 4875.88,3258.46 r0 top locked
U2 "LM60440AQRPKRQ1" "13-WQFN-HR (3x2)" 1250.41,214.8 r0 top
U3 "ST1L05APU33R" DFN-6(3x3) 625.72,204.79 r0 top
U4 "STM32H503RBT6" "64-LQFP (10x10)" 827.88,1741.09 r0 top locked
U5 "STMPS2161STR" SOT-23-5 822,964.62 r0 top locked
U6 "USBLC6-2SC6" SOT-23-6 300,999.25 r180 top locked
U7 "TCAN3414DR" "SOIC-8(0.154\", 3.90mm Width)" 4829.66,998.69 r270 top
U8 "THVD1449DR" "SOIC-8(0.154\", 3.90mm Width)" 5127.96,998.69 r270 top
U9 "TLP2361(TPL,E(T" SO-5 2914.67,740 r270 top
U10 "TLV9001IDCKR" SC-70-5 2110.05,1077.46 r180 top
U11 "PC817C" PC817C 2690.98,837.31 r270 top
U12 "TLP2361(TPL,E(T" SO-5 2470.97,759.66 r90 top
U13 "TLP2361(TPL,E(T" SO-5 4331.51,740 r270 top
U14 "TLV9001IDCKR" SC-70-5 3526.89,1078.32 r180 top
U15 "PC817C" PC817C 4107.82,838.17 r270 top
U16 "TLP2361(TPL,E(T" SO-5 3887.81,760.52 r90 top
U17 "TLP2361(TPL,E(T" SO-5 3527.55,3367.99 r90 top
U18 "TLV9001IDCKR" SC-70-5 4332.16,3033.24 r0 top
U19 "PC817C" PC817C 3751.24,3273.39 r90 top
U20 "TLP2361(TPL,E(T" SO-5 3971.25,3351.04 r270 top
U21 "TLP2361(TPL,E(T" SO-5 2111.57,3369.41 r90 top
U22 "TLV9001IDCKR" SC-70-5 2916.18,3031.1 r0 top
U23 "PC817C" PC817C 2335.26,3271.25 r90 top
U24 "TLP2361(TPL,E(T" SO-5 2555.27,3348.9 r270 top
X1 "24MHz" SMD2016-4P 387.39,1766.9 r270 top
X2 "32.7680KHZ" NX3215SA-32.768K-STD-MUA-8_ 386.49,1885.05 r0 top

## Footprints (in the part's own frame and the unit in brackets; to place one, negate y for a bottom-side part, rotate by r counter-clockwise, add the part's x,y. Pads: shape width x height; smd on the part's side, far side on the other; paste and mask are expansions set on the pad)
"13-WQFN-HR (3x2)" [mm]
  round 0.244 smd: 1(-0.694,1.194) 5(-0.694,-1.194) 7(0.694,-1.194) 11(0.694,1.194)
  rrect40% 0.65x0.25 smd: 2(-0.875,0.5) 3(-0.875,0) 4(-0.875,-0.5) 8(0.875,-0.5) 9(0.875,0) 10(0.875,0.5)
  rrect29% 0.35x0.65 smd: 6(0,-1.375) 12(0,1.375)
  rrect22% 0.45x1.45 smd: 13(0,0)
  Top Layer region: 1.2,-1.075 1.2,-1.225 1.196,-1.244 1.185,-1.26 1.169,-1.271 1.15,-1.275 1.15,-1.275 0.825,-1.275 0.806,-1.279 0.79,-1.29 0.779,-1.306 0.775,-1.325 0.775,-1.325 0.775,-1.65 0.771,-1.669 0.76,-1.685 0.744,-1.696 0.725,-1.7 0.725,-1.7 0.575,-1.7 0.55,-1.693 0.532,-1.675 0.525,-1.65 0.525,-1.65 0.525,-1.075 0.529,-1.056 0.54,-1.04 0.556,-1.029 0.575,-1.025 0.575,-1.025 1.15,-1.025 1.169,-1.029 1.185,-1.04 1.196,-1.056 1.2,-1.075 1.2,-1.075
  Top Layer region: -0.575,-1.7 -0.725,-1.7 -0.744,-1.696 -0.76,-1.685 -0.771,-1.669 -0.775,-1.65 -0.775,-1.65 -0.775,-1.325 -0.779,-1.306 -0.79,-1.29 -0.806,-1.279 -0.825,-1.275 -0.825,-1.275 -1.15,-1.275 -1.169,-1.271 -1.185,-1.26 -1.196,-1.244 -1.2,-1.225 -1.2,-1.225 -1.2,-1.075 -1.193,-1.05 -1.175,-1.032 -1.15,-1.025 -1.15,-1.025 -0.575,-1.025 -0.556,-1.029 -0.54,-1.04 -0.529,-1.056 -0.525,-1.075 -0.525,-1.075 -0.525,-1.65 -0.529,-1.669 -0.54,-1.685 -0.556,-1.696 -0.575,-1.7 -0.575,-1.7
  Top Layer region: -1.2,1.225 -1.196,1.244 -1.185,1.26 -1.169,1.271 -1.15,1.275 -1.15,1.275 -0.825,1.275 -0.806,1.279 -0.79,1.29 -0.779,1.306 -0.775,1.325 -0.775,1.325 -0.775,1.65 -0.771,1.669 -0.76,1.685 -0.744,1.696 -0.725,1.7 -0.725,1.7 -0.575,1.7 -0.55,1.693 -0.532,1.675 -0.525,1.65 -0.525,1.65 -0.525,1.075 -0.529,1.056 -0.54,1.04 -0.556,1.029 -0.575,1.025 -0.575,1.025 -1.15,1.025 -1.169,1.029 -1.185,1.04 -1.196,1.056 -1.2,1.075 -1.2,1.075
  Top Layer region: 0.575,1.7 0.725,1.7 0.744,1.696 0.76,1.685 0.771,1.669 0.775,1.65 0.775,1.65 0.775,1.325 0.779,1.306 0.79,1.29 0.806,1.279 0.825,1.275 0.825,1.275 1.15,1.275 1.169,1.271 1.185,1.26 1.196,1.244 1.2,1.225 1.2,1.225 1.2,1.075 1.193,1.05 1.175,1.032 1.15,1.025 1.15,1.025 0.575,1.025 0.556,1.029 0.54,1.04 0.529,1.056 0.525,1.075 0.525,1.075 0.525,1.65 0.529,1.669 0.54,1.685 0.556,1.696 0.575,1.7 0.575,1.7
  silkscreen extent -1.52,-1.59 1.1,1.59, body extent -1,-1.5 1,1.5, height 0.7
"64-LQFP (10x10)" [mm]
  rect 1.2x0.3 smd: 1(-5.75,3.75) 2(-5.75,3.25) 3(-5.75,2.75) 4(-5.75,2.25) 5(-5.75,1.75) 6(-5.75,1.25) 7(-5.75,0.75) 8(-5.75,0.25) 9(-5.75,-0.25) 10(-5.75,-0.75) 11(-5.75,-1.25) 12(-5.75,-1.75) 13(-5.75,-2.25) 14(-5.75,-2.75) 15(-5.75,-3.25) 16(-5.75,-3.75) 33(5.75,-3.75) 34(5.75,-3.25) 35(5.75,-2.75) 36(5.75,-2.25) 37(5.75,-1.75) 38(5.75,-1.25) 39(5.75,-0.75) 40(5.75,-0.25) 41(5.75,0.25) 42(5.75,0.75) 43(5.75,1.25) 44(5.75,1.75) 45(5.75,2.25) 46(5.75,2.75) 47(5.75,3.25) 48(5.75,3.75)
  rect 0.3x1.2 smd: 17(-3.75,-5.75) 18(-3.25,-5.75) 19(-2.75,-5.75) 20(-2.25,-5.75) 21(-1.75,-5.75) 22(-1.25,-5.75) 23(-0.75,-5.75) 24(-0.25,-5.75) 25(0.25,-5.75) 26(0.75,-5.75) 27(1.25,-5.75) 28(1.75,-5.75) 29(2.25,-5.75) 30(2.75,-5.75) 31(3.25,-5.75) 32(3.75,-5.75) 49(3.75,5.75) 50(3.25,5.75) 51(2.75,5.75) 52(2.25,5.75) 53(1.75,5.75) 54(1.25,5.75) 55(0.75,5.75) 56(0.25,5.75) 57(-0.25,5.75) 58(-0.75,5.75) 59(-1.25,5.75) 60(-1.75,5.75) 61(-2.25,5.75) 62(-2.75,5.75) 63(-3.25,5.75) 64(-3.75,5.75)
  silkscreen extent -6.63,-5.36 5.28,5.36, body extent -6,-6 6,6, height 1.6
178.6165.0002 [mm]
  rect 2.2x2.2 hole 1.5 paste-2539.97 mask+0.051: 1(-6.4,1.25)
  round 2.2 hole 1.5 paste-2539.97 mask+0.051: 2(-2.9,1.25) 3(2.9,1.25) 4(6.4,1.25) 5(6.4,-1.25) 6(2.9,-1.25) 7(-2.9,-1.25) 8(-6.4,-1.25)
  round 0 hole 2.5 unplated paste-2539.97: ""(0,0)
  silkscreen extent -10.03,-3.05 10.03,3.05, body extent -10,-3 10,3, height 17.5
B3U-1000P [mm] "SWITCH TACTILE SPST-NO 0.05A 12V"
  rect 0.82x1.72 smd: 1(-1.7,0) 2(1.7,0)
  silkscreen extent -1.57,-1.3 1.57,1.3, body extent -2,-1.26 2,1.24, height 1.6
Cap-0201 [mm]
  rect 0.3x0.3 smd mask+0.055: 1(-0.3,0) 2(0.3,0)
  silkscreen extent -0.53,-0.23 0.53,0.23, body extent -0.3,-0.15 0.3,0.15, height 0.28
Cap-0402 [mil]
  rect 18x25 smd mask+2.36: 1(-18.5,0) 2(18.5,0)
  silkscreen extent -31,-16 31,16, body extent -20,-10 20,10, height 19
Cap-0603 [mil]
  rect 30x35 smd mask+2.36: 1(-30,0) 2(30,0)
  silkscreen extent -49,-21 49,21, body extent -32,-16 31,16, height 34
Cap-0805 [mil] "SMD 0805"
  rect 40x60 smd mask+2.76: 1(-40,0) 2(40,0)
  silkscreen extent -64,-34 64,34, body extent -39,-25 39,25, height 30
Cap-1206 [mil] "SMD 1206"
  rect 60x70 smd: 1(-50,0) 2(50,0)
  silkscreen extent -84,-39 84,39, body extent -63,-31 63,32, height 39
DB128L-5.08-3P-OG-S [mm]
  rect 2.4x2.4 hole 1.6 paste-2539.97 mask+0.051: 1(-5.08,0)
  round 2.4 hole 1.6 paste-2539.97 mask+0.051: 2(0,0) 3(5.08,0)
  silkscreen extent -7.62,-5.1 8.12,5, body extent -7.62,-4.99 8.22,5.01, height 13.97
DB128V-5.08-5P-GN-S [mm]
  round 2.3 hole 1.5 paste-2539.97 mask+0.05: 1(-10.16,0) 2(-5.08,0) 3(0,0) 4(5.08,0) 5(10.16,0)
  silkscreen extent -13.26,-5.2 12.7,5, body extent -13.3,-5.2 12.7,5, height 14
DFN-2(0.3x0.6) [mm]
  rect 0.27x0.26 smd mask+0.05: 1(-0.195,0) 2(0.195,0)
  silkscreen extent -0.41,-0.2 0.41,0.2, body extent -0.3,-0.15 0.3,0.15, height 0.3
DFN-6(3x3) [mm]
  rect 0.8x0.5 smd paste+0 mask+0.051: 1(-1.6,0.95) 2(-1.6,0) 3(-1.6,-0.95) 4(1.6,-0.95) 5(1.6,0) 6(1.6,0.95)
  rect 1.55x2.3 smd paste+0 mask+0.051: 7(0,0)
  silkscreen extent -2.26,-1.52 1.52,1.52, body extent -1.5,-1.5 1.5,1.5, height 1.04
"Diode 1610" [mm]
  rect 0.4x1 smd paste+0 mask+0.051: 1(-0.55,0) 2(0.55,0)
  silkscreen extent -1.27,-0.61 0.88,0.62, body extent -0.8,-0.5 0.8,0.5, height 0.57
DSIC03LSGET [mil]
  rect 90x60 smd paste+0 mask+2: 1(-177.16,100) 2(-177.16,0) 3(-177.16,-100) 4(177.17,-100) 5(177.17,0) 6(177.17,100)
  silkscreen extent -118,-150 118,150, body extent -183,-150 183,150, height 163
Fuse-0805 [mm]
  rect 1x1.7 smd: 1(-1.1,0) 2(1.1,0)
  silkscreen extent -0.41,-0.81 0.41,0.81, body extent -1.1,-0.75 1.1,0.75, height 1.24
"G6DN-1A-SL DC24" [mm]
  rect 1.8x1.8 hole 1.2 paste-2539.97 mask+0.051: 1(-8.89,0)
  round 1.8 hole 1.2 paste-2539.97 mask+0.051: 2(-6.35,0) 5(1.27,0) 8(8.89,0)
  silkscreen extent -9.96,-3.81 10.36,1.27, body extent -9.75,-3.81 10.25,1.28, height 12.3
HC-RJ45-5622-1-6-Y [mil]
  round 60 hole 39.37 paste-99999 mask+2: 1(175,175) 2(125,75) 3(74.99,175) 4(25,75) 5(-25,175) 6(-75,75) 7(-125.01,175) 8(-175,75)
  round 0 hole 125.98 unplated paste-99999: ""(-225,-175) ""(225,-175)
  silkscreen extent -300,-480 300,225, body extent -299,-478 299,223, height 465
HDR1X2_ [mm] "CONN HEADER VERT 2POS 2.54MM"
  rect 1.5x1.5 hole 0.9: 1(0,0)
  round 1.5 hole 0.9: 2(2.54,0)
  silkscreen extent -1.27,-1.27 3.81,1.27, body extent -1.27,-1.27 3.81,1.27, height 8.44
HDR1X3_ [mm] "Connector; Header; 3 Position"
  rect 1.5x1.5 hole 0.9: 1(0,0)
  round 1.5 hole 0.9: 2(2.54,0) 3(5.08,0)
  silkscreen extent -1.27,-1.27 6.35,1.27, body extent -1.27,-1.24 6.35,1.25, height 8.54
LED-0603 [mm]
  rect 0.5x1 smd: 1(-0.75,0) 2(0.75,0)
  silkscreen extent -1.12,-0.66 1.75,0.66, body extent -0.82,-0.37 0.82,0.36, height 0.68
NX3215SA-32.768K-STD-MUA-8_ [mm]
  rect 1x1.8 smd: 1(-1.25,0) 2(1.25,0)
  silkscreen extent -0.51,-0.79 0.51,0.79, body extent -1.6,-0.75 1.6,0.75, height 0.8
PC817C [mm]
  rect 2x1.8 smd paste+0 mask+0.051: 1(-5.1,1.27) 2(-5.1,-1.27) 3(5.1,-1.27) 4(5.1,1.27)
  silkscreen extent -6.4,-2.29 3.32,2.31, body extent -5.15,-2.3 5.15,2.3, height 4.64
Res-0402 [mil]
  rect 18x25 smd mask+2.17: 1(-18.5,0) 2(18.5,0)
  silkscreen extent -32,-17 32,16, body extent -23,-11 23,11, height 16
Res-0603 [mil]
  rect 30x35 smd: 1(-30,0) 2(30,0)
  silkscreen extent -48,-21 48,21, body extent -31,-17 31,17, height 18
RES-0805 [mil] "SMD 0805"
  rect 40x50 smd: 1(-40,0) 2(40,0)
  silkscreen extent -64,-29 64,29, body extent -39,-25 39,24, height 24
Res-1206 [mil]
  rect 60x70 smd: 1(-50,0) 2(50,0)
  silkscreen extent -84,-39 84,39, body extent -63,-31 63,31, height 24
RVT1H470M0607 [mm]
  rect 3.5x1.6 smd: 1(-2.8,0) 2(2.8,0)
  silkscreen extent -4.27,-3.33 3.32,3.33, body extent -3.5,-3.3 3.5,3.3, height 7.7
SC-70-5 [mm]
  rect 0.73x0.38 smd: 1(-0.95,0.65) 2(-0.95,0) 3(-0.95,-0.65) 4(0.95,-0.65) 5(0.95,0.65)
  silkscreen extent -1.57,-1.04 0.46,1.04, body extent -1.05,-1 1.05,1, height 0.95
SMB_ [mm]
  rect 2.8x2.4 smd: 1(-2.3,0) 2(2.3,0)
  silkscreen extent -2.21,-1.9 4.83,1.91, body extent -2.7,-1.8 2.7,1.8, height 2.3
SMD2016-4P [mm]
  rect 1x0.8 smd paste+0 mask+0.051: 1(-0.75,-0.6) 2(0.75,-0.6) 3(0.75,0.6) 4(-0.75,0.6)
  silkscreen extent -1.42,-0.84 1.04,0.84, body extent -1,-0.8 1,0.8, height 0.47
SO-5 [mm]
  rect 1.4x0.8 smd paste+0 mask+0.051: 1(-3.15,1.27) 3(-3.175,-1.27) 4(3.15,-1.27) 5(3.175,0) 6(3.15,1.27)
  silkscreen extent -4.12,-1.9 2.3,1.9, body extent -3.5,-1.85 3.5,1.85, height 2.2
SOD323F [mm]
  rect 0.6x0.6 smd: 1(-1.05,0) 2(1.05,0)
  silkscreen extent -0.91,-0.79 2.11,0.79, body extent -1.25,-0.68 1.25,0.68, height 1
SOD-123 [mm]
  rect 0.95x0.9 smd: 1(-1.575,0) 2(1.575,0)
  silkscreen extent -1.37,-0.8 2.82,0.8, body extent -1.82,-0.78 1.83,0.78, height 1.5
SOD-323 [mm]
  rect 0.8x0.9 smd mask+0.055: 1(-1.15,0) 2(1.15,0)
  silkscreen extent -2.01,-0.79 0.94,0.79, body extent -1.3,-0.67 1.3,0.67, height 1.1
"SOIC-8(0.154\", 3.90mm Width)" [mm]
  rect 1.55x0.6 smd: 1(-2.7,1.905) 2(-2.7,0.635) 3(-2.7,-0.635) 4(-2.7,-1.905) 5(2.7,-1.905) 6(2.7,-0.635) 7(2.7,0.635) 8(2.7,1.905)
  silkscreen extent -3.79,-2.51 1.8,2.51, body extent -3.01,-2.45 3.01,2.45, height 1.63
SON-8(5x6) [mm]
  rect 1.372x0.71 smd paste-0.15: 1(-1.385,1.905) 2(-1.385,0.635) 3(-1.385,-0.635) 4(-1.385,-1.905)
  rect 0.5x0.5 smd paste-1 mask+0: 5(1.385,0) 6(1.385,0.635) 7(1.385,-0.635) 8(2.032,0)
  Top Layer region: 4.841,1.55 4.251,1.55 4.251,0.99 4.841,0.99 4.841,0.28 4.251,0.28 4.251,-0.28 4.841,-0.28 4.841,-0.99 4.251,-0.99 4.251,-1.55 4.841,-1.55 4.841,-2.26 0.401,-2.26 0.401,2.26 4.841,2.26
  silkscreen extent -2.37,-2.58 4.39,2.58, body extent -1.61,-2.5 4.39,2.5, height 1.05
SOT-23 [mm] "TRANS NPN 40V 0.6A SOT23"
  rect 0.82x0.92 smd: 1(-0.95,-1) 2(0.95,-1) 3(0,1)
  silkscreen extent -1.68,-1.3 1.55,0.81, body extent -1.5,-1.25 1.5,1.25, height 1.05
Sot-23 [mm] "TRANS NPN 40V 0.6A SOT23"
  rect 0.82x0.92 smd: 1(-0.95,-1) 2(0.95,-1) 3(0,1)
  silkscreen extent -1.68,-1.3 1.55,0.81, body extent -1.5,-1.25 1.5,1.25, height 1.05
SOT-23-5 [mm]
  rect 1.1x0.6 smd: 1(-1.3,0.95) 2(-1.3,0) 3(-1.3,-0.95) 4(1.3,-0.95) 5(1.3,0.95)
  silkscreen extent -2.13,-1.5 0.88,1.5, body extent -1.4,-1.45 1.4,1.45, height 1.45
SOT-23-6 [mm]
  rect 1.22x0.62 smd: 1(-1.31,0.95) 2(-1.31,0) 3(-1.31,-0.95) 4(1.31,-0.95) 5(1.31,0) 6(1.31,0.95)
  silkscreen extent -2.18,-1.52 0.86,1.52, body extent -1.5,-1.5 1.5,1.5, height 1.47
SOT-323-5 [mm]
  rect 1x0.35 smd: 1(-0.95,0.65) 2(-0.95,0) 3(-0.95,-0.65) 4(0.95,-0.65) 5(0.95,0.65)
  silkscreen extent -1.73,-1.12 0.51,1.12, body extent -1.05,-1.05 1.05,1.05, height 1
SOT-523 [mm]
  rect 0.4x0.51 smd: 1(-0.5,-0.645) 2(0.5,-0.645) 3(0,0.645)
  silkscreen extent -0.97,-0.76 0.86,0.46, body extent -0.8,-0.8 0.8,0.8, height 0.8
SRP1265A-150M [mm]
  rect 2.924x5.82 smd paste+0 mask+0.051: 1(5.628,0) 2(-5.628,0)
  silkscreen extent -6.33,-6.33 6.33,6.33, body extent -6.47,-6.25 6.43,6.25, height 6.31
SVZ1VM221FBRE00RAXXX [mm]
  rect 4.2x1.4 smd paste+0 mask+0.051: 1(-3.267,0) 2(3.267,0)
  silkscreen extent -4.2,-4.23 4.2,4.23, body extent -5,-4.15 5,4.15, height 10.05
TC2030-IDC_ [mm] "CABLE ADAPTER 6 POS"
  round 0.787 smd: 1(-1.27,-0.635) 1(-1.27,-0.635) 2(-1.27,0.635) 3(0,-0.635) 4(0,0.635) 5(1.27,-0.635) 6(1.27,0.635)
  round 0 hole 2.375 unplated: MP1(-2.54,-2.54) MP2(0.635,-2.54) MP3(0.635,2.54) MP4(-2.54,2.54)
  round 0 hole 0.991 unplated: MP5(-2.54,0) MP6(2.54,-1.016) MP7(2.54,1.016)
  silkscreen extent -3.86,-3.86 3.2,3.86
Test-point [mil]
  oct 60x60 smd: 1(0,0)
  silkscreen extent -37,-37 37,37
U263-163N-4BQC65 [mm]
  rect 0.3x0.87 smd: A1(-2.75,0.865) A4(-1.25,0.865) A5(-0.75,0.865) A6(-0.25,0.865) A7(0.25,0.865) A8(0.75,0.865) A9(1.25,0.865) A12(2.75,0.865) B1(2.75,-0.865) B4(1.25,-0.865) B5(0.75,-0.865) B6(0.25,-0.865) B7(-0.25,-0.865) B8(-0.75,-0.865) B9(-1.25,-0.865) B12(-2.75,-0.865)
  round 0 hole 0.52 unplated: MH(-3.75,0)
  round 0 hole 0.6 slot 0.72 at 0 deg unplated: MH(3.75,0)
  oval 1.35x1.1 hole 0.6 slot 0.85 at 0 deg: S1(-2.4,2.15) S2(2.4,2.15) S3(2.4,-2.15) S4(-2.4,-2.15)
  silkscreen extent -4.39,-1.7 4.39,1.7, body extent -4.49,-2.28 4.45,2.32, height 6.55
UCD-220uF-10mmDia [mm] "0.406\" L x 0.406\" W (10.30mm x 10.30mm)"
  rect 4x2.5 smd: 1(-4,0) 2(4,0)
  silkscreen extent -5.95,-5.21 5.13,5.21, body extent -5.45,-5.15 5.45,5.15, height 10.8
WS2812D-F5 [mm]
  round 1.1 hole 0.72 paste-2539.97 mask+0.051: 1(1.95,0) 2(0.65,0) 3(-0.65,0) 4(-1.95,0)
  silkscreen extent -2.91,-2.9 2.51,2.9, body extent -2.9,-2.9 2.51,2.9, height 8.7

## Part data
C1 C2: library part UCD1H221MNL1GS, "CAP ALUM 220UF 20% 50V SMD", Case/Package=Radial, LCSC Part Number=C116211, Leakage Current=3uA, Manufacturer=Nichicon, Max Operating Temperature=105°C, Min Operating Temperature=-55°C, Package Quantity=1, Ripple Current=700mA, Supplier Part Number 1=493-6390-1-ND, Tolerance=20%, Voltage=50V, Capacitance=220uF, Category="Aluminum Electrolytic Capacitors", ComponentLink1Description=https://datasheet.ciiva.com/11776/0900766b80ebdadd-11776792.pdf?src-supplier=RSComponents, ComponentLink1URL=https://datasheet.ciiva.com/11776/0900766b80ebdadd-11776792.pdf?src-supplier=RSComponents, ComponentLink2Description=https://datasheet.ciiva.com/5362/e-cd-22158-5362489.pdf?src-supplier=Mouser, ComponentLink2URL=https://datasheet.ciiva.com/5362/e-cd-22158-5362489.pdf?src-supplier=Mouser, ComponentLink3Description=https://datasheet.ciiva.com/11684/e-cd-11684678.pdf?src-supplier=Avnet, ComponentLink3URL=https://datasheet.ciiva.com/11684/e-cd-11684678.pdf?src-supplier=Avnet, ComponentLink4Description=https://datasheet.ciiva.com/15037/e-cd-15037119.pdf?src-supplier=Digi-Key, ComponentLink4URL=https://datasheet.ciiva.com/15037/e-cd-15037119.pdf?src-supplier=Digi-Key, ComponentLink5Description=https://datasheet.ciiva.com/16393/e-cd-16393493.pdf?src-supplier=Future+Electronics, ComponentLink5URL=https://datasheet.ciiva.com/16393/e-cd-16393493.pdf?src-supplier=Future+Electronics, ComponentLink6Description=https://datasheet.ciiva.com/17354/e-cd-17354606.pdf?src-supplier=Avnet+Europe, ComponentLink6URL=https://datasheet.ciiva.com/17354/e-cd-17354606.pdf?src-supplier=Avnet+Europe, Construction=Cylindrical, Diameter=10mm, Dissipation Factor=0.1%, Features="General Purpose", Height=10mm, Height - Seated (Max)=0.394inch, Impedance=160mR, Item Type=Capacitor, Lead Free="Lead Free", Length=10mm, Life (Hours)=5000Hour, Manufacturer Part Number=UCD1H221MNL1GS, Mount="Surface Mount,PCB", Packaging="Tape and Reel", Pricing 1="1=0.85000, 10=0.60200, 50=0.45480, 100=0.39620 (USD)", Radiation Hardening=No, RoHS=Yes, RoHS Compliant=Yes, Series=CD, Supplier 1=Digi-Key, Termination=SMD/SMT, Voltage Rating=50V, Voltage Rating (DC)=50V
C3: library part RVT1H470M0607, "47uF 50V 66mA@120Hz ±20% SMD,D6.3xL7.7mm Aluminum Electrolytic Capacitors - SMD ROHS", LCSC Part Number=C72523, Manufacturer=ROQANG, Package=SMD,D6.3xL7.7mm, ComponentLink1Description=LCSC, ComponentLink1URL=https://www.lcsc.com/product-detail/Aluminum-Electrolytic-Capacitors-SMD_ROQANG-RVT1H470M0607_C72523.html, Item Type=Capacitor, Manufacturer Part Number=RVT1H470M0607
C4: library part CC0805JRX7R0BB223, "CAP CER 0.022UF 100V X7R 0805", Case/Package=0805, Dielectric=X7R, LCSC Part Number=C576993, Manufacturer=Yageo, Max Operating Temperature=125°C, Min Operating Temperature=-55°C, Tolerance=5%, ComponentLink1Description=https://datasheet.ciiva.com/11494/upy-np0x7r-mv-100-to-630v-9-11494760.pdf?src-supplier=Avnet, ComponentLink1URL=https://datasheet.ciiva.com/11494/upy-np0x7r-mv-100-to-630v-9-11494760.pdf?src-supplier=Avnet, Construction=Flat, Depth=1.25mm, Height=0.85mm, Item Type=Capacitors, Length=2mm, Manufacturer Part Number=CC0805JRX7R0BB223, Mounting Technology="Surface Mount", Pricing="1=0.13, 10=0.07, 50=0.0488, 100=0.0421, 500=0.03086, 1000=0.02736 (USD)", RoHS=Yes, RoHS Compliant=Yes, Stock=2257, Supplier=Digikey
C5: library part GRM21BR61H106ME43L, "CAP CER 10UF 50V X5R 0805", LCSC Part Number=C2190942, Manufacturer=Murata, Supplier Part Number 1=490-18664-1-ND, Category="Ceramic Capacitors", Manufacturer Part Number=GRM21BR61H106ME43L, Pricing 1="1=0.44000, 10=0.30700, 50=0.21500, 100=0.18420, 500=0.13818, 1000=0.11668 (USD)", RoHS=Yes, Stock 1=26, Supplier 1=Digi-Key
C6 C8 C18: library part CL10A105KB8NNNC, "CAP CER 1UF 50V X5R 0603", Case Code (Imperial)=0603, Case Code (Metric)=1608, Dielectric=X5R, LCSC Part Number=C15849, Manufacturer=Samsung, Max Operating Temperature=85°C, Min Operating Temperature=-55°C, Tolerance=10%, Voltage Rating=50V, Case/Package=0603, Category="Ceramic Capacitors", ComponentLink1Description=https://datasheet.ciiva.com/26877/getdatasheetpartid-753736-26877879.pdf?src-supplier=Verical, ComponentLink1URL=https://datasheet.ciiva.com/26877/getdatasheetpartid-753736-26877879.pdf?src-supplier=Verical, Depth=0.8mm, Item Type=Capacitor, Length=1.6mm, Manufacturer Part Number=CL10A105KB8NNNC, Material=4241ConductorMaterial, Mounting Technology="Surface Mount", Packaging="Tape and Reel", Pricing="4000=0.01632, 8000=0.01595, 16000=0.01557, 24000=0.0152, 32000=0.01482 (USD)", Radiation Hardening=No, RoHS=Yes, RoHS Compliant=Yes, Series=CL, Stock=780446, Supplier=Avnet, Supplier Part Number=CL10A105KB8NNNC, Voltage Rating (DC)=50V
C7 C9 C16 C45 C46 C49 C50 C51 C54 C55 C56 C59 C60 C61 C64: library part CL10B104KB8WPNC, "CAP CER 0.1UF 50V X7R 0603", Case Code (Imperial)=0603, Case Code (Metric)=1608, LCSC Part Number=C307348, Max Operating Temperature=125°C, Min Operating Temperature=-55°C, Ratings=AEC-Q200, Supplier Part Number=2575919, Tolerance=10%, Voltage Rating=50V, Case/Package=0603, Category="Ceramic Capacitors", ComponentLink1Description=LCSC, ComponentLink2Description=http://www.farnell.com/datasheets/2710560.pdf?src-supplier=Farnell, ComponentLink2URL=http://www.farnell.com/datasheets/2710560.pdf?src-supplier=Farnell, ComponentLink3Description=http://www.samsungsem.com/kr/support/product-search/mlcc/CL10B104KB8WPNC.jsp?src-supplier=Digi-Key, ComponentLink3URL=http://www.samsungsem.com/kr/support/product-search/mlcc/CL10B104KB8WPNC.jsp?src-supplier=Digi-Key, ComponentLink4Description=http://www.farnell.com/datasheets/2710560.pdf?src-supplier=Element14, ComponentLink4URL=http://www.farnell.com/datasheets/2710560.pdf?src-supplier=Element14, ComponentLink5Description=https://datasheet.octopart.com/CL10B104KB8WPNC-Samsung-Electro-Mechanics-datasheet-120093645.pdf?src-supplier=Future+Electronics, ComponentLink5URL=https://datasheet.octopart.com/CL10B104KB8WPNC-Samsung-Electro-Mechanics-datasheet-120093645.pdf?src-supplier=Future+Electronics, ComponentLink6Description=http://www.farnell.com/datasheets/2710560.pdf?src-supplier=Newark, ComponentLink6URL=http://www.farnell.com/datasheets/2710560.pdf?src-supplier=Newark, ComponentLink7Description=http://www.samsungsem.com/servlet/FileDownload?type=spec&file=CL10B104KB8WPNC.pdf&src-supplier=Avnet, ComponentLink7URL=http://www.samsungsem.com/servlet/FileDownload?type=spec&file=CL10B104KB8WPNC.pdf&src-supplier=Avnet, ComponentLink8Description=https://datasheet.octopart.com/CL10B104KB8WPNC-Samsung-datasheet-8326407.pdf?src-supplier=TME, ComponentLink8URL=https://datasheet.octopart.com/CL10B104KB8WPNC-Samsung-datasheet-8326407.pdf?src-supplier=TME, Height=900um, Item Type=Capacitor, Lead Free=5697LeadFree, Material=4241ConductorMaterial, Mounting Technology="Surface Mount", Packaging="Cut Tape", Pricing="100=0.021, 500=0.019, 1000=0.015, 2000=0.01 (GBP)", RoHS=Yes, RoHS Compliant=Yes, Series=CL, Stock=400, Supplier=Rs, Voltage Rating (DC)=50V
C10 C19 C20: library part UMK316AB7475KL-T, "CAP CER 4.7UF 50V X7R 1206", Case Code (Imperial)=1206, Case Code (Metric)=3216, Dielectric=X7R, LCSC Part Number=C92853, Manufacturer="Taiyo Yuden", Max Operating Temperature=125°C, Min Operating Temperature=-55°C, Package Quantity=2000, Tolerance=10%, Voltage Rating=50V, Case/Package=1206, ComponentLink1Description=https://datasheet.ciiva.com/170/umk316ab7475kl-t-ss-170928.pdf?src-supplier=Digikey, ComponentLink1URL=https://datasheet.ciiva.com/170/umk316ab7475kl-t-ss-170928.pdf?src-supplier=Digikey, ComponentLink2Description=https://datasheet.ciiva.com/2990/umk316ab7475kl-t-ss-2990070.pdf?src-supplier=Avnet, ComponentLink2URL=https://datasheet.ciiva.com/2990/umk316ab7475kl-t-ss-2990070.pdf?src-supplier=Avnet, ComponentLink3Description=https://datasheet.ciiva.com/15922/1010umk316ab7475kl-t-15922628.pdf?src-supplier=Onlinecomponents.com, ComponentLink3URL=https://datasheet.ciiva.com/15922/1010umk316ab7475kl-t-15922628.pdf?src-supplier=Onlinecomponents.com, ComponentLink4Description=https://datasheet.ciiva.com/7975/1481447-7975911.pdf?src-supplier=Element14, ComponentLink4URL=https://datasheet.ciiva.com/7975/1481447-7975911.pdf?src-supplier=Element14, ComponentLink5Description=https://datasheet.ciiva.com/5413/mlcc-all-e-541559-5413006.pdf?src-supplier=Mouser, ComponentLink5URL=https://datasheet.ciiva.com/5413/mlcc-all-e-541559-5413006.pdf?src-supplier=Mouser, Construction=Flat, Depth=1.6mm, Height=1.6mm, Item Type=Capacitor, Length=3.2mm, Manufacturer Part Number=UMK316AB7475KL-T, Mounting Technology="Surface Mount", Packaging="Tape and Reel", Pins=2, Pricing="1=0.3, 10=0.198, 50=0.146, 100=0.1189, 500=0.09386, 1000=0.07925 (USD)", Radiation Hardening=No, Reach SVHC Compliant=Unknown, RoHS=Yes, RoHS Compliant=Yes, Series=M, Stock=392550, Supplier=Digikey, Termination=SMD/SMT, Voltage Rating (DC)=50V, Width=1.6mm
C11 C12: library part CC1206JKX7R9BB224, "CAP CER 0.22UF 50V X7R 1206", LCSC Part Number=C527274, Manufacturer=Yageo, Supplier Part Number=4639209, Category="Ceramic Capacitors", ComponentLink1Description=https://datasheet.ciiva.com/13210/upy-gp-np0-16v-to-50v-8-13210060.pdf?src-supplier=Mouser, ComponentLink1URL=https://datasheet.ciiva.com/13210/upy-gp-np0-16v-to-50v-8-13210060.pdf?src-supplier=Mouser, ComponentLink2Description=https://datasheet.ciiva.com/11466/upy-gphc-x7r-6-3v-to-50v-8-11466351.pdf?src-supplier=Avnet, ComponentLink2URL=https://datasheet.ciiva.com/11466/upy-gphc-x7r-6-3v-to-50v-8-11466351.pdf?src-supplier=Avnet, Item Type=Capacitor, Manufacturer Part Number=CC1206JKX7R9BB224, Pricing="3000=0.0381, 9000=0.0366, 15000=0.036, 30000=0.0351, 60000=0.0337 (USD)", RoHS=Yes, Stock=3000, Supplier="Future Electronics"
C13 C14 C15: library part GRM31CR61E476ME44L, "CAP CER 47UF 25V X5R 1206", Dielectric=X5R, LCSC Part Number=C403725, Manufacturer=Murata, Supplier Part Number 1=490-16268-2-ND, Tolerance=20%, Voltage Rating (DC)=25V, Capacitance=47uF, Category="Ceramic Capacitors", ComponentLink1Description=https://search.murata.co.jp/Ceramy/image/img/A01X/partnumbering_e_01.pdf?src-supplier=Digi-Key, ComponentLink1URL=https://search.murata.co.jp/Ceramy/image/img/A01X/partnumbering_e_01.pdf?src-supplier=Digi-Key, Item Type=Capacitor, Length=3.2mm, Manufacturer Part Number=GRM31CR61E476ME44L, RoHS=Yes, Supplier 1=Digi-Key, Thickness=1.6mm, Width=1.6mm
C17: library part CC0402CRNPO9BN6R8, "CAP CER 6.8PF 50V C0G/NPO 0402", Case Code (Imperial)=0402, Case Code (Metric)=1005, Dielectric=C0G, Insulation Resistance=10GR, LCSC Part Number=C189470, Manufacturer=Yageo, Max Operating Temperature=125°C, Min Operating Temperature=-55°C, Supplier Part Number=3247368, Tolerance=2%, Voltage Rating=50V, Case/Package=0402, Category="Ceramic Capacitors", ComponentLink1Description=https://datasheet.ciiva.com/11587/upy-gp-np0-16v-to-50v-8-11587182.pdf?src-supplier=Avnet, ComponentLink1URL=https://datasheet.ciiva.com/11587/upy-gp-np0-16v-to-50v-8-11587182.pdf?src-supplier=Avnet, Construction=Flat, Depth=0.5mm, Height=0.5mm, Item Type=Capacitor, Length=1mm, Manufacturer Part Number=CC0402CRNPO9BN6R8, Mounting Technology="Surface Mount", Packaging="Tape and Reel", Pricing="10000=0.0024, 40000=0.0022, 150000=0.0021, 400000=0.002, 1000000=0.0019 (USD)", Radiation Hardening=No, RoHS=Yes, RoHS Compliant=Yes, Series=CC, Stock=200000, Supplier="Future Electronics", Termination=SMD/SMT, Voltage Rating (DC)=50V, Weight=2.3E-05oz, Width=0.5mm
C21 C22: library part GRM155R61E225KE11D, "CAP CER 2.2UF 25V X5R 0402", Capacitance=2.2uF, Case Code (Imperial)=0402, Case Code (Metric)=1005, Dielectric=X5R, LCSC Part Number=C385032, Manufacturer=Murata, Max Operating Temperature=85°C, Min Operating Temperature=-55°C, Package Quantity=10000, Resistor Type=Ceramic, Tolerance=10%, Voltage Rating=25V, Case/Package=0402, Category="Ceramic Capacitors", ComponentLink1Description=http://www.mouser.com/ds/2/281/c02e-2905.pdf?src-supplier=Mouser, ComponentLink1URL=http://www.mouser.com/ds/2/281/c02e-2905.pdf?src-supplier=Mouser, ComponentLink2Description=http://search.murata.co.jp/Ceramy/image/img/A01X/G101/ENG/GRM155R61E225KE11-01.pdf?src-supplier=Digi-Key, ComponentLink2URL=http://search.murata.co.jp/Ceramy/image/img/A01X/G101/ENG/GRM155R61E225KE11-01.pdf?src-supplier=Digi-Key, ComponentLink3Description=http://search.murata.co.jp/Ceramy/image/img/A01X/partnumbering_e_01.pdf?src-supplier=Digi-Key, ComponentLink3URL=http://search.murata.co.jp/Ceramy/image/img/A01X/partnumbering_e_01.pdf?src-supplier=Digi-Key, ComponentLink4Description=http://psearch.en.murata.com/capacitor/product/GRM155R61E225KE11%23.pdf?src-supplier=Avnet, ComponentLink4URL=http://psearch.en.murata.com/capacitor/product/GRM155R61E225KE11%23.pdf?src-supplier=Avnet, Height=0.5mm, Item Type=Capacitor, Lead Free="Lead Free", Length=1mm, Manufacturer Part Number=GRM155R61E225KE11D, Material=Ceramic, Mount="Surface Mount", Packaging="Tape and Reel", Pricing 1="10000=0.03830, 20000=0.03623, 40000=0.03416, 60000=0.03209, 80000=0.03002, 100000=0.02795, 1000000=0.02588 (USD)", RoHS=Yes, RoHS Compliant=Yes, Stock 1=210000, Supplier 1=Avnet, Supplier Part Number 1=GRM155R61E225KE11D, Termination=SMD/SMT, Thickness=0.022inch, Voltage Rating (DC)=25V, Weight=0.000212oz, Width=0.5mm
C23 C36 C38: library part CC0402KRX5R6BB475, "CAP CER 4.7UF 10V X5R 0402", Case Code (Imperial)=0402, Case Code (Metric)=1005, LCSC Part Number=C326586, Manufacturer=Yageo, Max Operating Temperature=85°C, Min Operating Temperature=-55°C, Supplier Part Number 1=3871698, Tolerance=10%, Voltage Rating=10V, Capacitance=4.7uF, Case/Package=0402, Category="Ceramic Capacitors", ComponentLink1Description=http://www.yageo.com/documents/recent/UPY-GPHC_X5R_4V-to-50V_25.pdf?src-supplier=Digi-Key, ComponentLink1URL=http://www.yageo.com/documents/recent/UPY-GPHC_X5R_4V-to-50V_25.pdf?src-supplier=Digi-Key, Manufacturer Part Number=CC0402KRX5R6BB475, Mount="Surface Mount", Packaging="Cut Tape", Pricing 1="10000=0.02310, 50000=0.02100 (GBP)", RoHS=Yes, RoHS Compliant=Yes, Stock 1=20000, Supplier 1=Farnell
C24 C25 C26 C27 C30 C31 C37 C39 C40 C41 C42 C43 C44 C47 C52 C57 C62: library part CC0402JRX7R7BB104, "CAP CER 0.1UF 16V X7R 0402", Case Code (Imperial)=0402, Case Code (Metric)=1005, Dielectric=X7R, LCSC Part Number=C541464, Manufacturer=Yageo, Max Operating Temperature=125°C, Min Operating Temperature=-55°C, Package Quantity=10000, Supplier Part Number=311-1676-1-ND, Tolerance=5%, Voltage Rating=16V, Case/Package=0402, Category="Ceramic Capacitors", ComponentLink1Description=https://datasheet.ciiva.com/13210/upy-gphc-x7r-6-3v-to-50v-8-12304-13210152.pdf?src-supplier=Mouser, ComponentLink1URL=https://datasheet.ciiva.com/13210/upy-gphc-x7r-6-3v-to-50v-8-12304-13210152.pdf?src-supplier=Mouser, Construction=Flat, Halogen Free="Halogen Free", Height=0.5mm, Item Type=Capacitor, Lead Free="Lead Free", Length=0.039inch, Manufacturer Part Number=CC0402JRX7R7BB104, Material=4241ConductorMaterial, Mounting Technology="Surface Mount", Packaging="Tape and Reel", Pricing="1=0.1, 10=0.046, 50=0.0262, 100=0.0203, 500=0.01528, 1000=0.012, 2500=0.01091, 5000=0.01004 (USD)", RoHS=Yes, RoHS Compliant=Yes, Series=CC, Stock=1659111, Supplier=Digikey, Thickness=0.022inch, Voltage Rating (DC)=16V, Width=0.02inch